# Altium PCB EEM_FMC_Carrier.PcbDoc (part 1 of 19)
Units mm, origin at the board's own origin, x right, y up, seen from the top; angles counter-clockwise.
Board outline 222.9 x 100 mm, 6 copper layers (TopLayer, MidLayer1, MidLayer2, SignalLayer1, Internal Plane 1, BottomLayer), stack 1.528 mm thick; 790 components, 743 nets, 3570 pads, 2277 vias.
Unrouted connection lines stored in the file: 3.
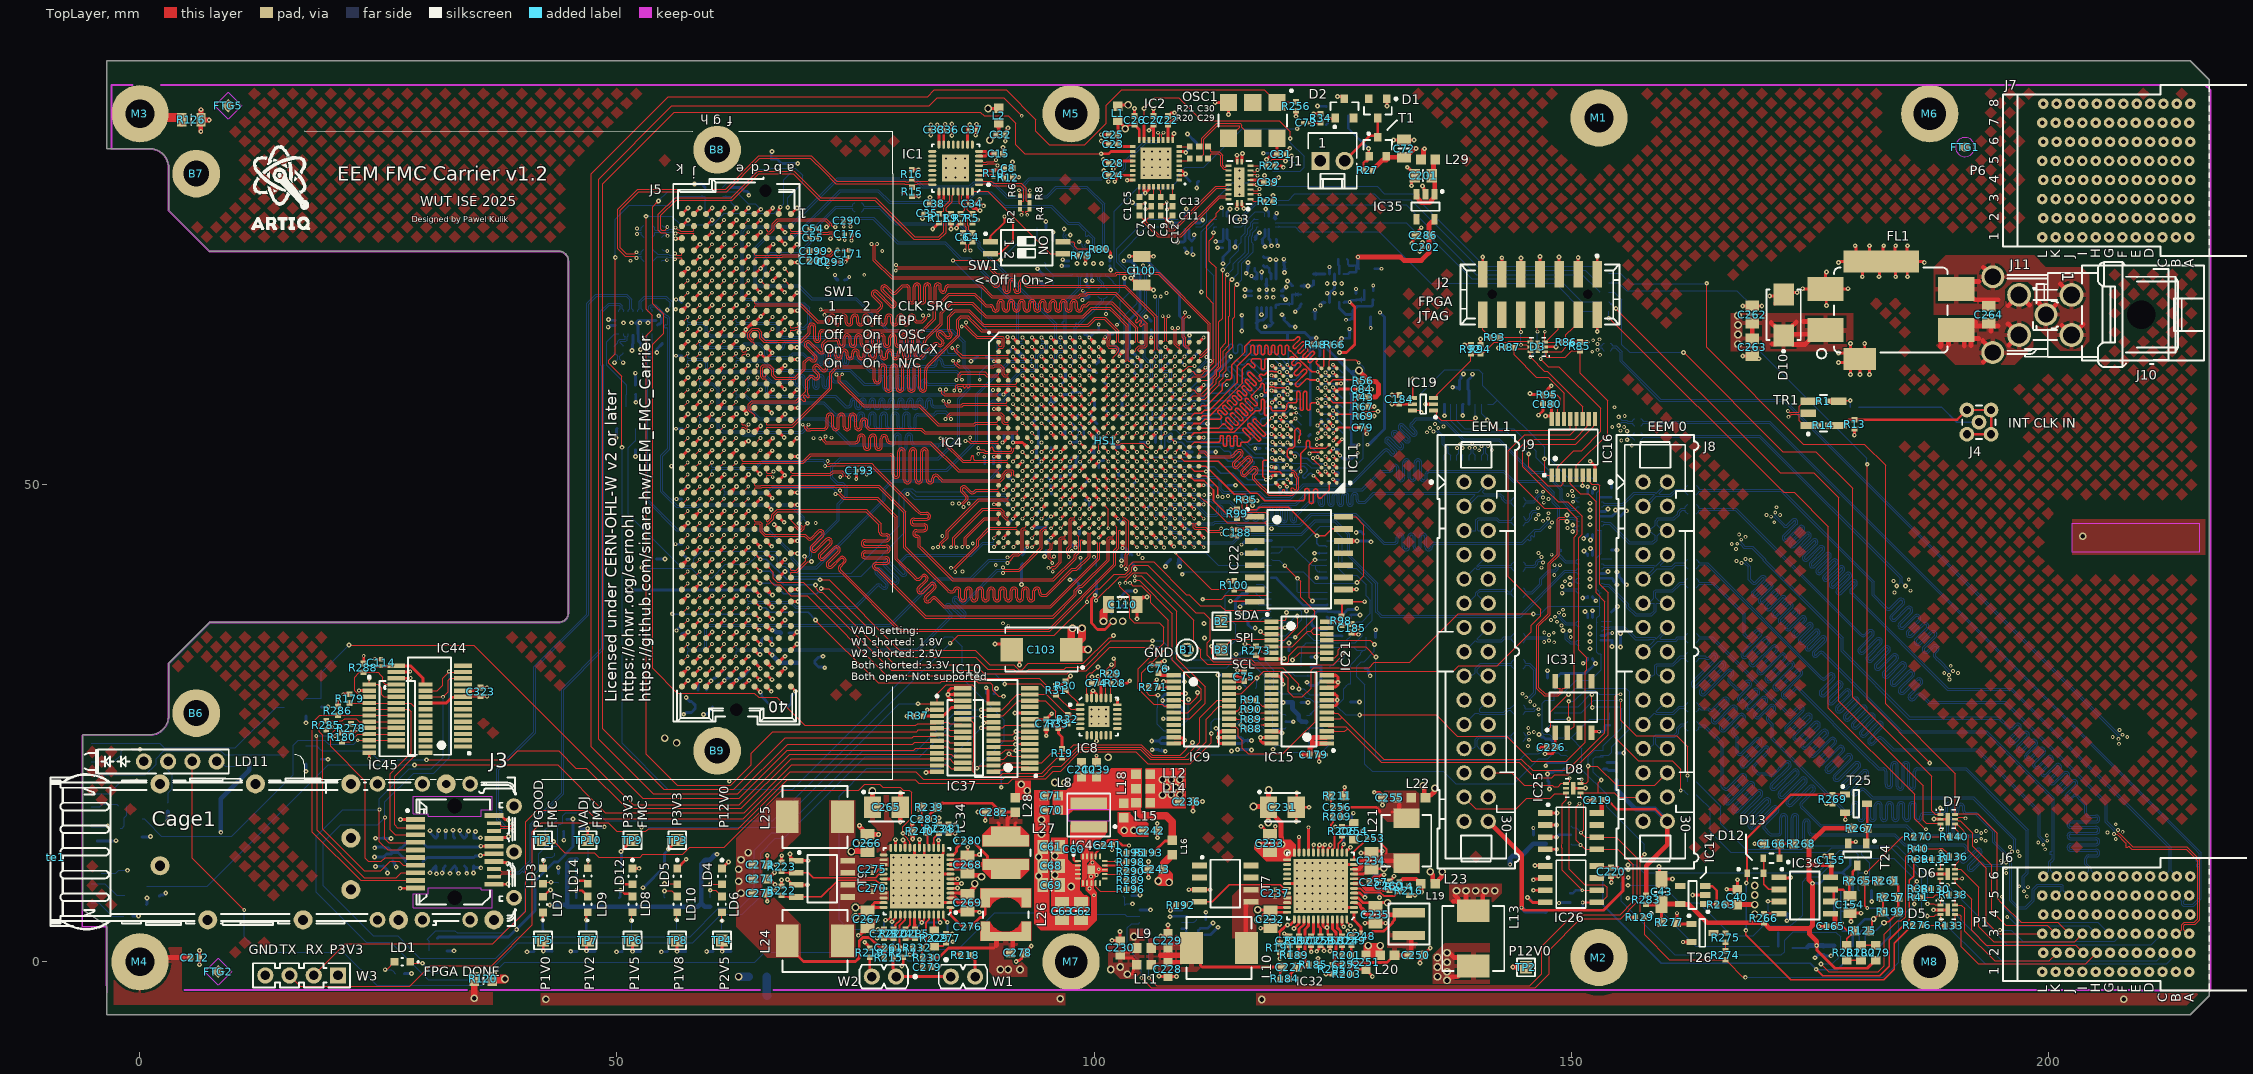
[diagram p0: TopLayer view]
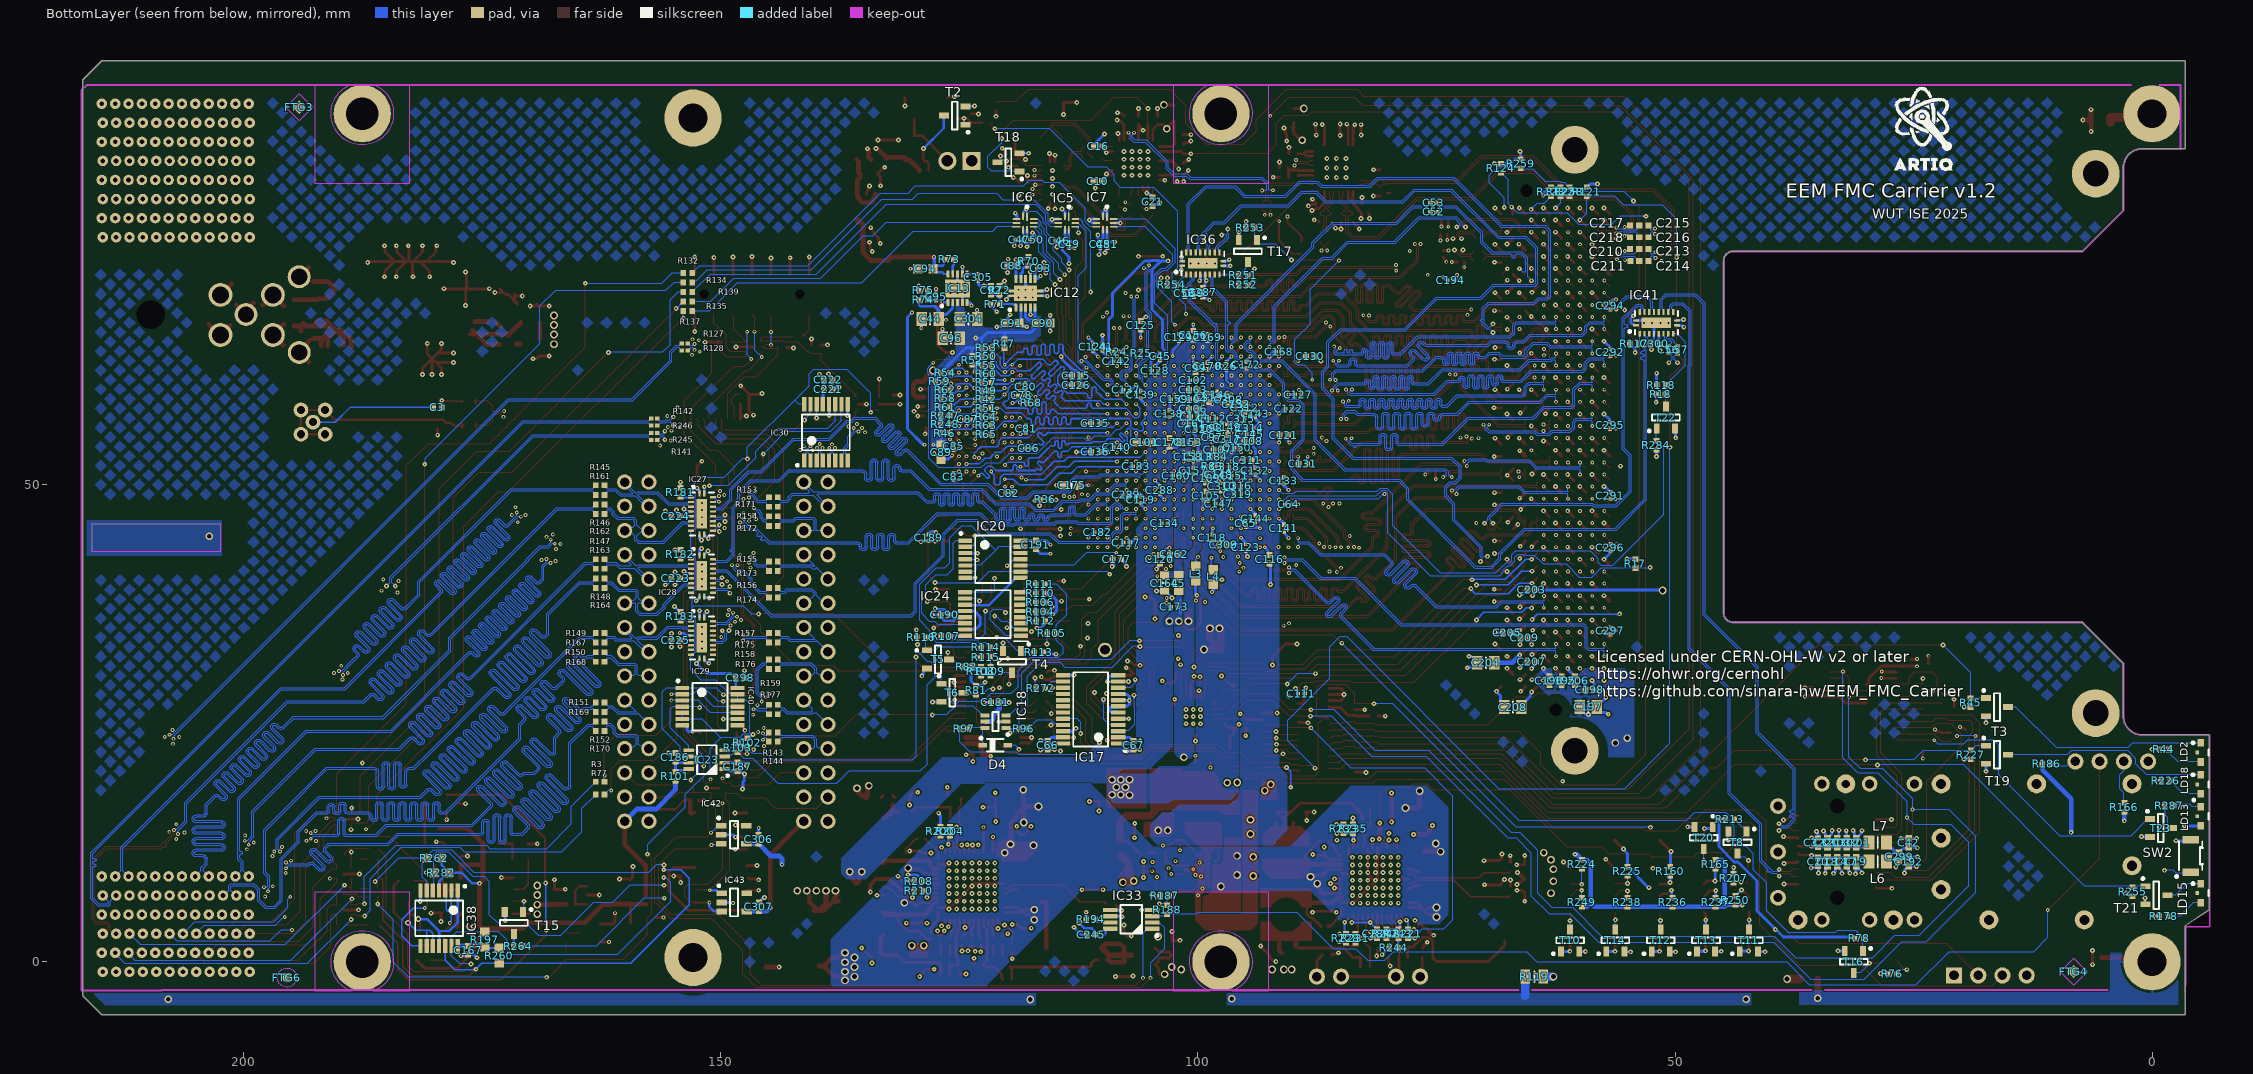
[diagram p1: BottomLayer view, seen from below]
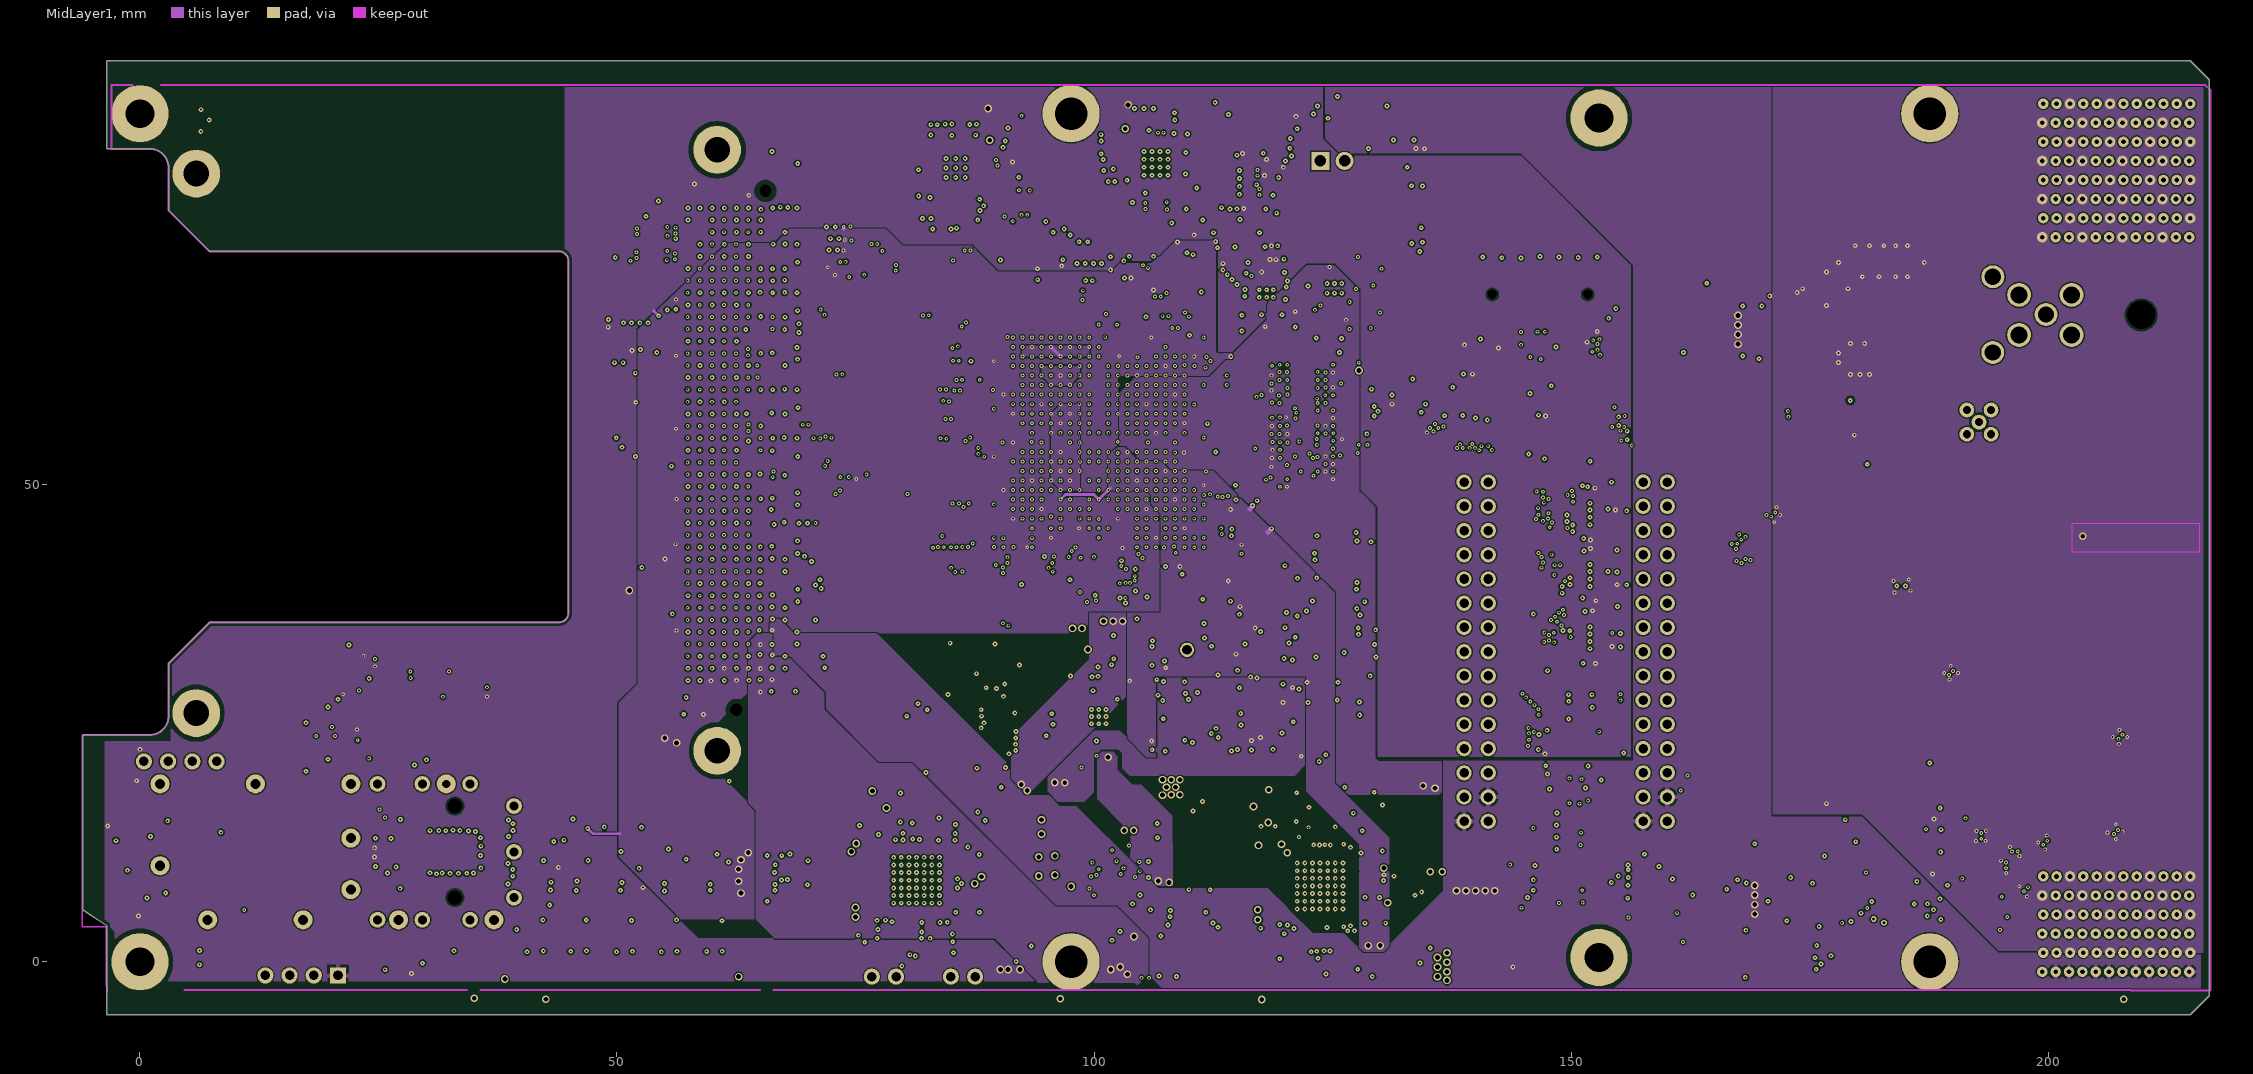
[diagram p2: MidLayer1]
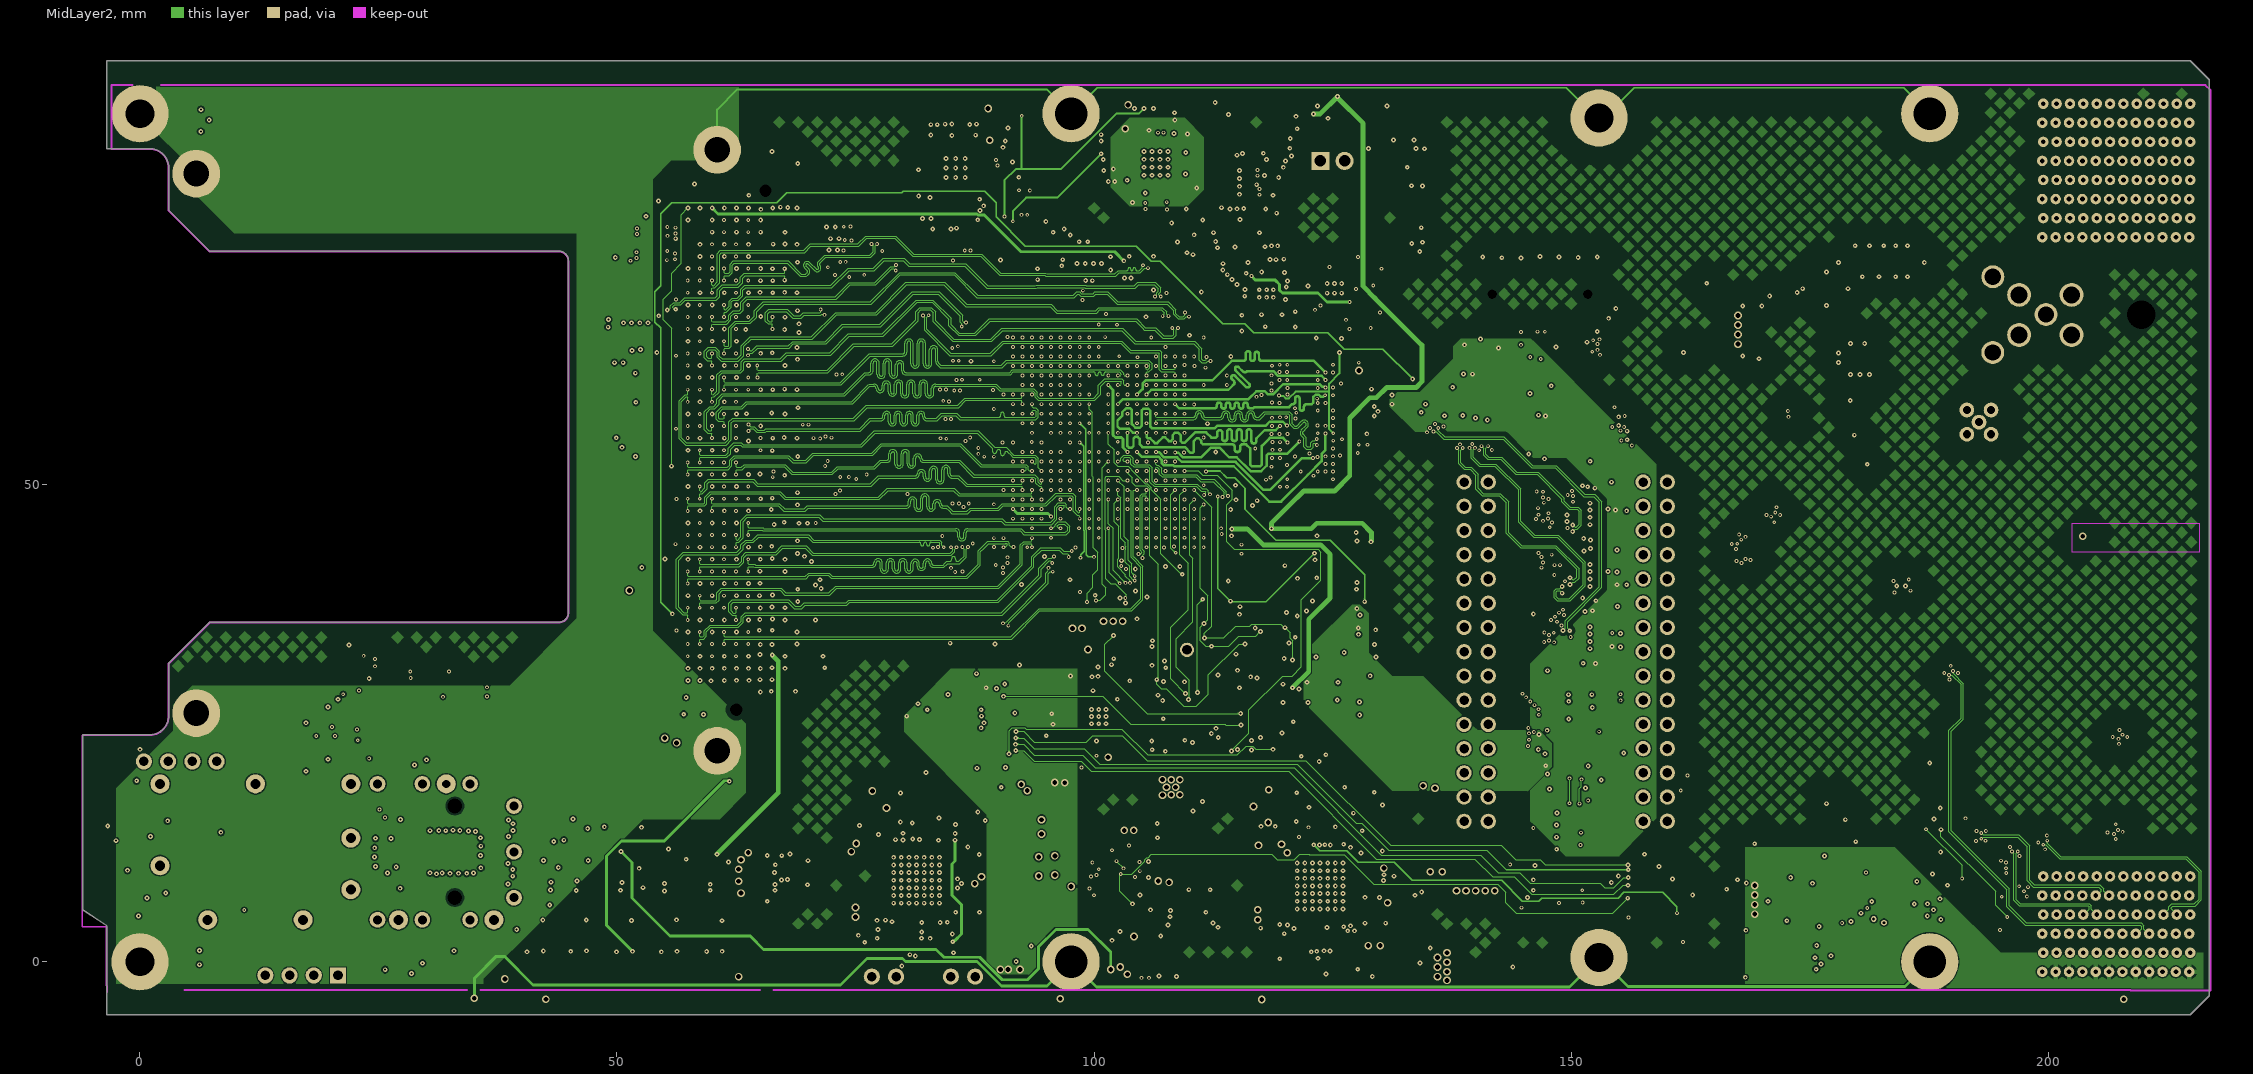
[diagram p3: MidLayer2]
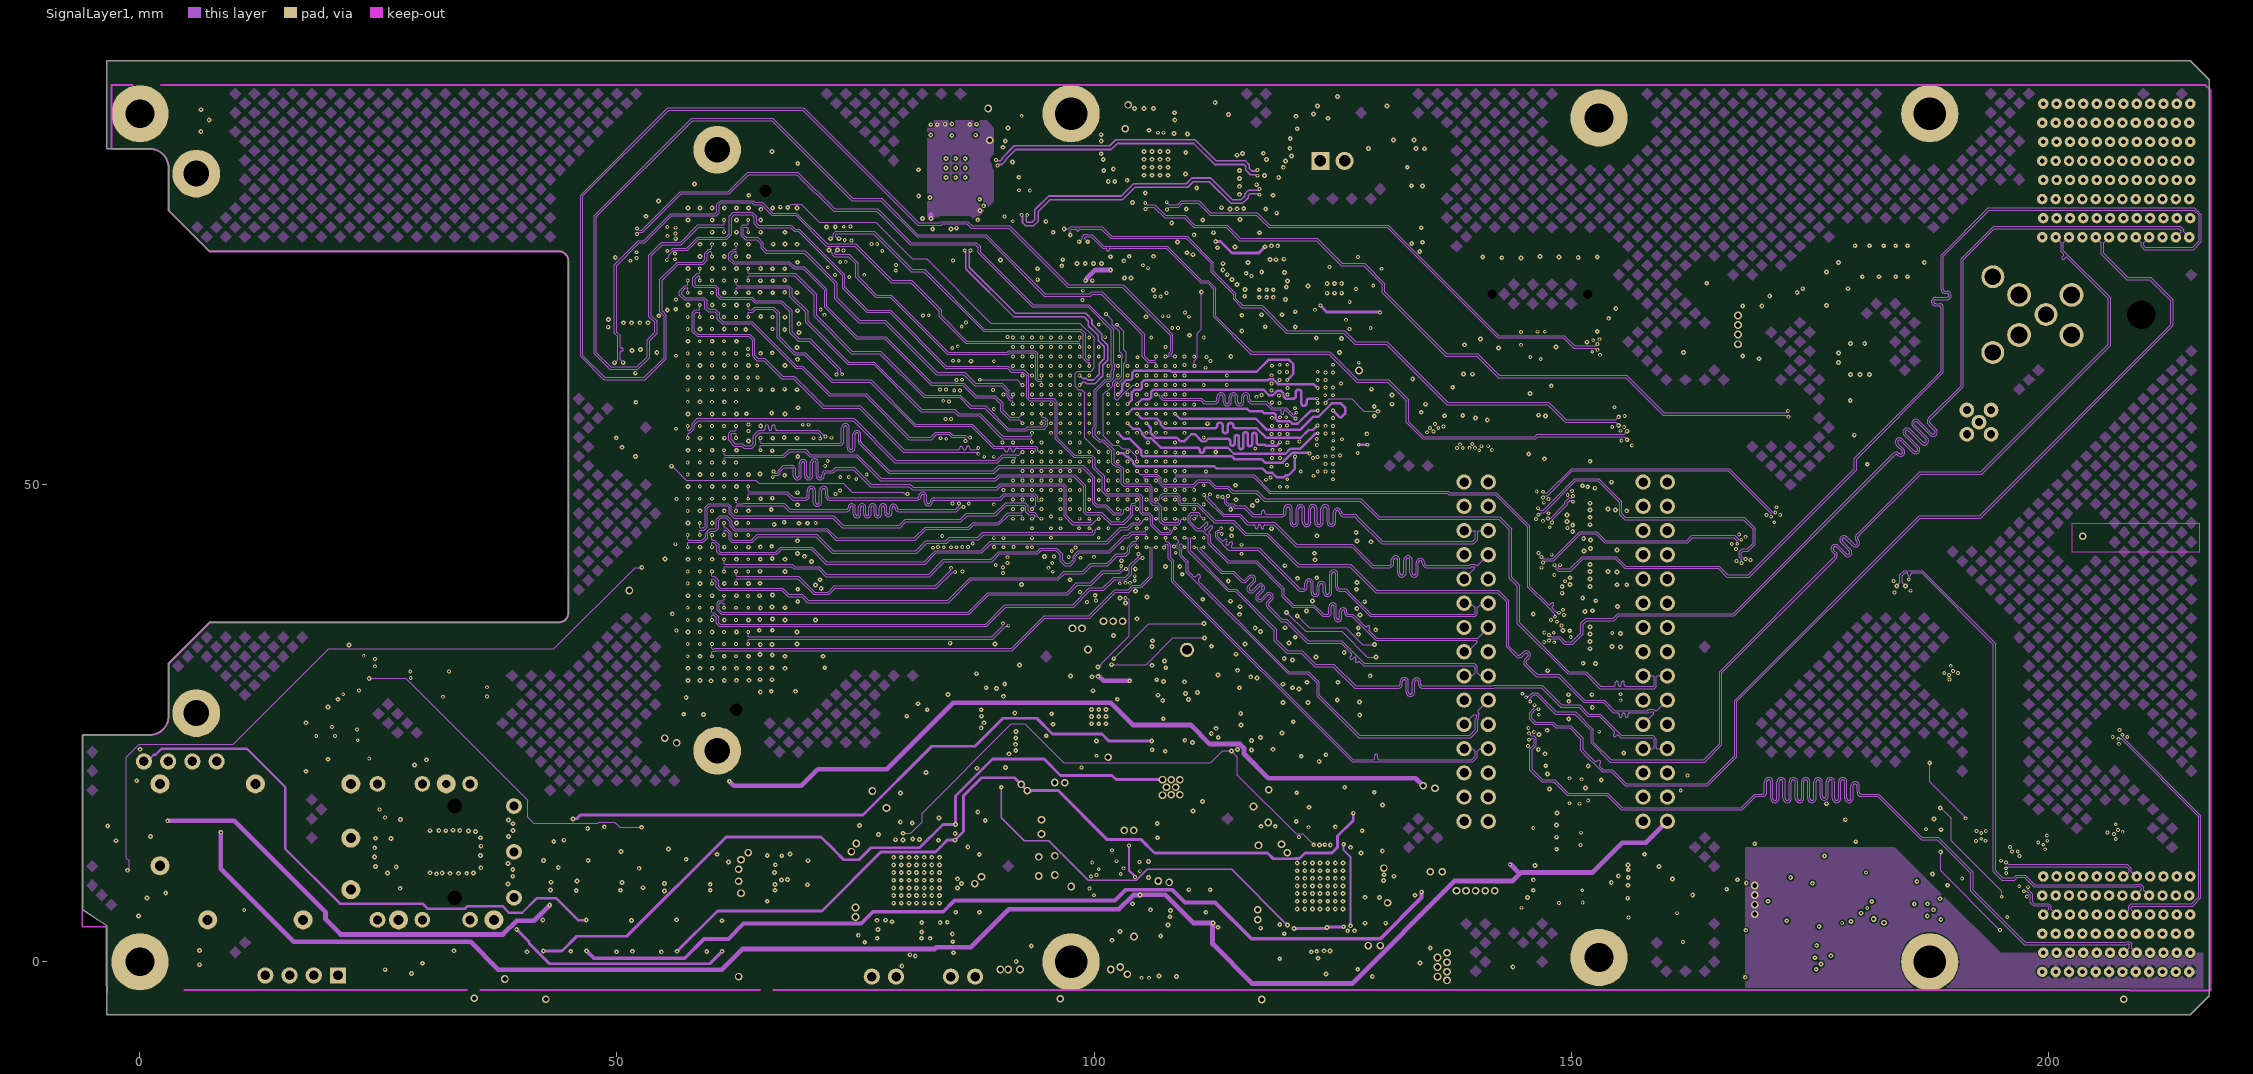
[diagram p4: SignalLayer1]
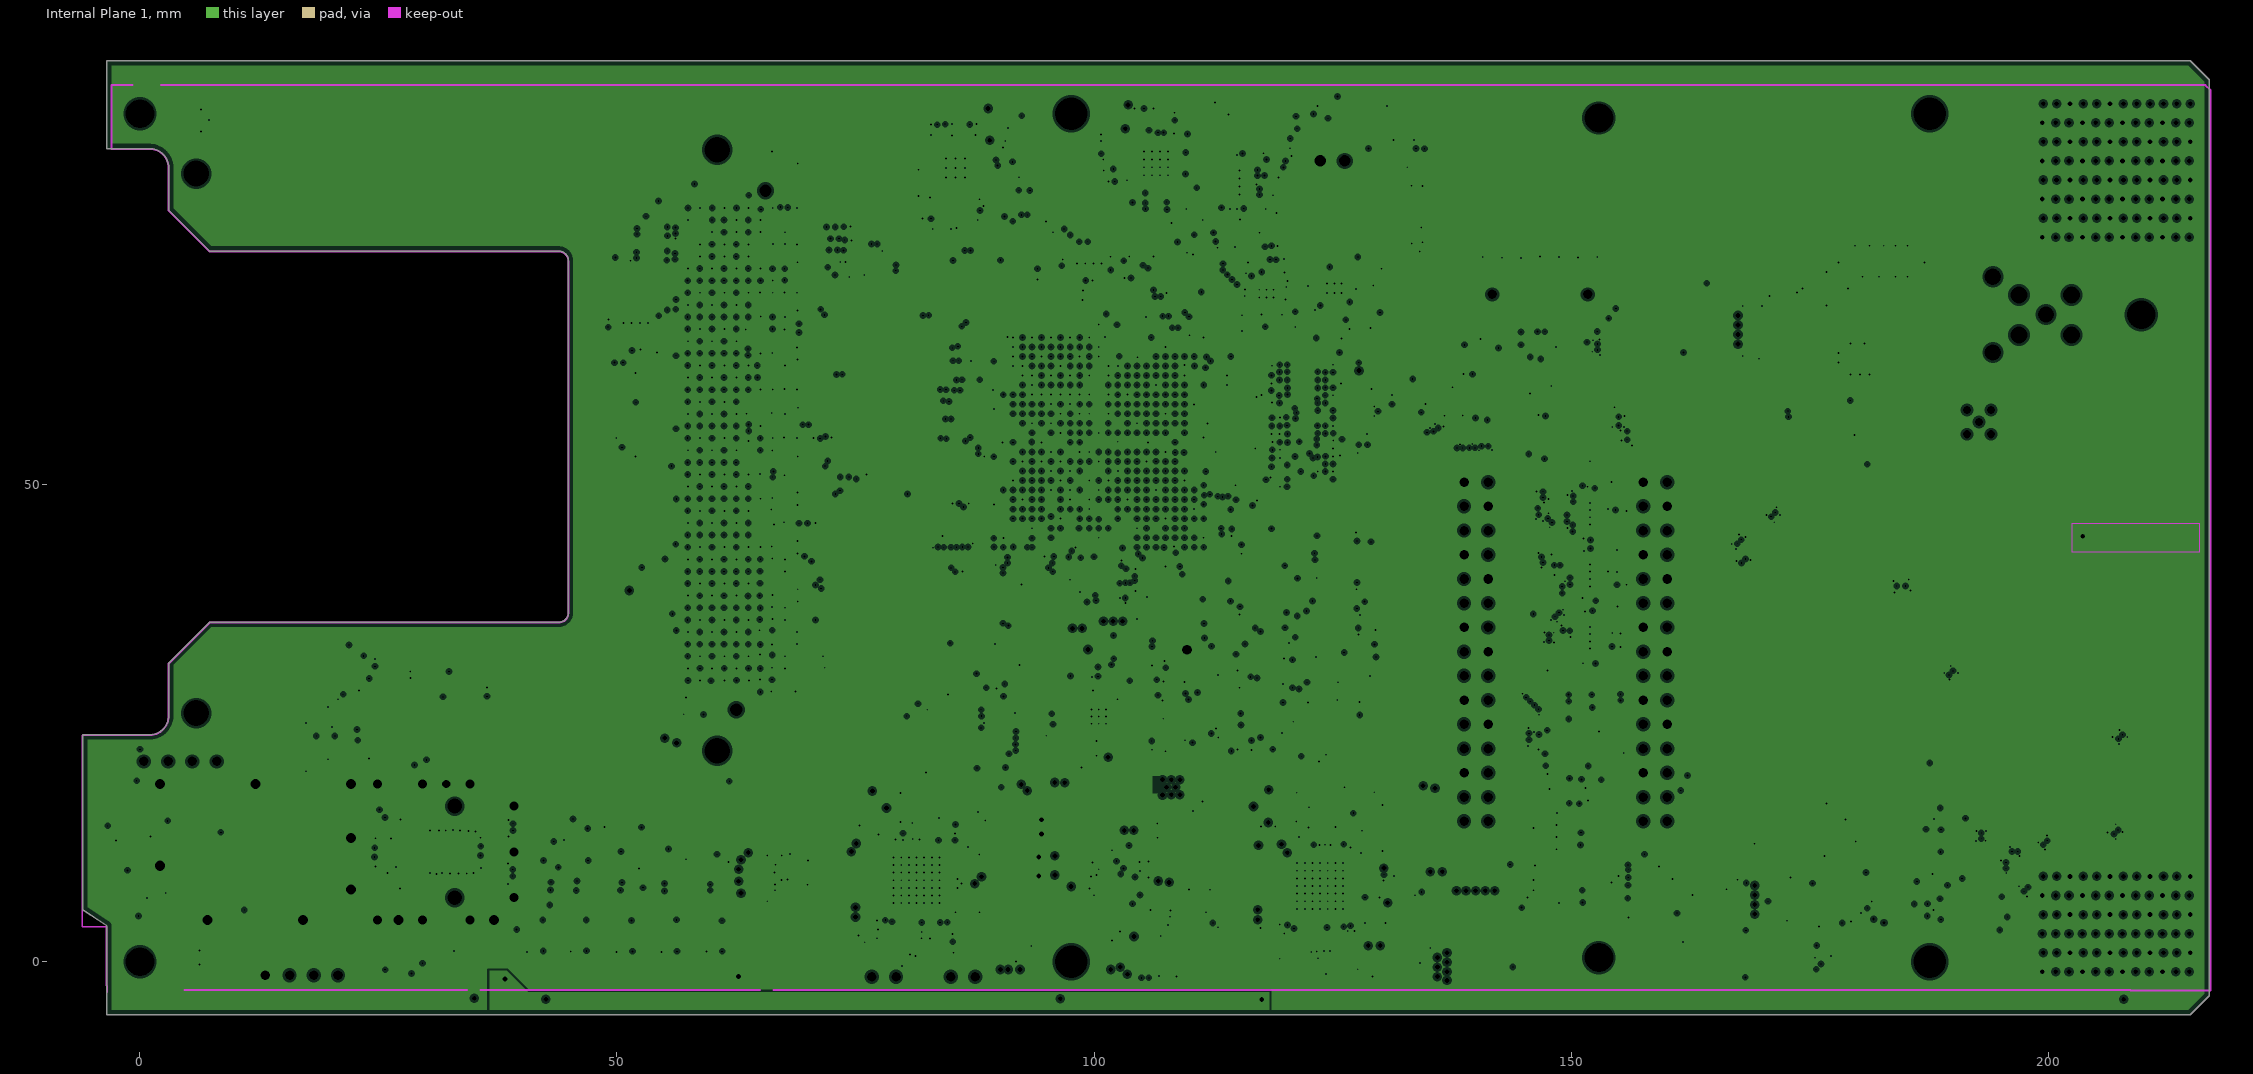
[diagram p5: Internal Plane 1, clearances drawn from the general rule]

## Layer stack, top to bottom
TopSolder: solder mask 0.022, Solder Resist, Dk 3.5
TopLayer: signal copper 0.053
Dielectric1: core 0.11, FR-4, Dk 4.2
MidLayer1: signal copper 0.018
Dielectric2: prepreg 0.2, FR-4, Dk 4.2
MidLayer2: signal copper 0.018
Dielectric3: core 0.73, FR-4, Dk 4.2
SignalLayer1: signal copper 0.018
Dielectric4: prepreg 0.2, FR-4, Dk 4.2
Internal Plane 1: plane copper 0.018, net (Multiple Nets)
Dielectric5: core 0.11, FR-4, Dk 4.2
BottomLayer: signal copper 0.053
BottomSolder: solder mask 0.022, Solder Resist, Dk 3.5

## Board outline
-3.5,-5.55 -3.5,3.8 -6,5.45 -6,23.8 -3.002,23.8 0.998,23.8 ccw(c0.998,25.8) 2.998,25.8 2.998,31.3 7.298,35.6 43.898,35.6 ccw(c43.898,36.6) 44.898,36.6 44.898,73.5 ccw(c43.898,73.5) 43.898,74.5 7.273,74.5 7.298,74.5 2.998,78.8 2.998,83.25 ccw(c0.998,83.25) 0.998,85.25 -3.5,85.25 -3.5,94.45 214.9,94.45 216.9,92.45 216.9,-3.55 214.9,-5.55

## Design rules (kind name [scope] priority, off if disabled: settings)
AcuteAngle [All] p1: minimum=4.50000000000000E+0001 checktracksonly=FALSE
AssemblyTestPointUsage [All] p1 off:
AssemblyTestpoint [All] p1 off: testpointundercomponent=TRUE minsize=1.016 maxsize=2.54 preferedsize=1.524 minholesize=0 maxholesize=1.016 preferedholesize=0.813 testpointgrid=0.025 usegrid=TRUE gridtolerance=0 allowsidetop=TRUE allowsidebottom=TRUE
BoardOutlineClearance BoardOutlineClearance_1 [OnLayer('BottomOverlay', 'TopOverlay')] p1: gap=0 ignorepadtopadclearanceinfootprint=FALSE
BoardOutlineClearance [All] p2: gap=0.4 ignorepadtopadclearanceinfootprint=FALSE
Clearance Clearance_Balancing [InPolygonClass('Copper_Balancing') vs InAnyNet] p1: gap=2 ignorepadtopadclearanceinfootprint=FALSE
Clearance Clearance_front [InComponent('LD15', 'LD18', 'LD2', 'J3', 'SW2', 'LD13'); vs OnLayer('Keep-Out Layer')] p2: gap=0 ignorepadtopadclearanceinfootprint=FALSE
Clearance Clearance_FPGA_outer [IsVia and WithinRoom('U_FPGA_FMC') vs IsCopperRegion] p3: gap=0.254 ignorepadtopadclearanceinfootprint=FALSE except(0: Arc-Hole Track-Hole SMDPad-Hole THPad-Hole Via-Hole Fill-Hole Poly-Hole Region-Hole Text-Hole Hole-Hole; 0.125: Via-Fill Via-Poly Via-Region; 0.2: Arc-Region Track-Region SMDPad-Region THPad-Region Fill-Region Poly-Region Region-Region)
Clearance Clearance_mounting_hole_top_bottom [InPadClass('MH') vs OnTop or OnBottom] p4: gap=1 ignorepadtopadclearanceinfootprint=FALSE except(0: Hole-Hole)
Clearance Clearance_mounting_holes [InPadClass('MH') vs OnCopper] p5: gap=0.5 ignorepadtopadclearanceinfootprint=FALSE except(0: Hole-Hole)
Clearance Clearance_mgt_via [(Net like ('*MGT*' )) and IsVia vs (Net like ('*MGT*' )) and IsVia] p6: gap=0.08 ignorepadtopadclearanceinfootprint=FALSE except(0: Hole-Hole; 0.4: Via-Via)
Clearance Clearance_diff_via [IsVia vs IsVia] p7: gap=0.254 ignorepadtopadclearanceinfootprint=FALSE except(0: Arc-Hole Track-Hole SMDPad-Hole THPad-Hole Via-Hole Fill-Hole Poly-Hole Region-Hole Text-Hole Hole-Hole; 0.2: Via-Via; 0.245: THPad-Fill THPad-Poly THPad-Region)
Clearance Clearance_DDR [InNetClass('50Ohm') and not (TouchesRoom('U_FPGA_FMC') or TouchesRoom('U_FPGA_SDRAM'))] p8: gap=0.254 ignorepadtopadclearanceinfootprint=TRUE except(0: Arc-Hole Track-Hole SMDPad-Hole THPad-Hole Via-Hole Fill-Hole Poly-Hole Region-Hole Text-Hole Hole-Hole; 0.54: Arc-Arc Arc-Track Track-Track)
Clearance Clearance_diff [InDifferentialPairClass('All Differential Pairs') and not TouchesRoom('U_FPGA_FMC')] p9: gap=0.54 ignorepadtopadclearanceinfootprint=FALSE except(0: Arc-Hole Track-Hole SMDPad-Hole THPad-Hole Via-Hole Fill-Hole Poly-Hole Region-Hole Text-Hole; 0.076: Arc-Via Track-Via SMDPad-Via; 0.1: Arc-Arc Arc-Track Arc-SMDPad Track-Track Track-SMDPad; 0.125: Track-Region SMDPad-Region; 0.127: THPad-Fill THPad-Poly THPad-Region; 0.15: Arc-Region Via-Fill Via-Poly Via-Region Region-Region; 0.2: Arc-THPad Track-THPad SMDPad-SMDPad THPad-Via Via-Via)
Clearance Clearance_outer [OnLayer('TopLayer') or OnLayer('BottomLayer')] p10: gap=0.1 ignorepadtopadclearanceinfootprint=TRUE except(0.089: Arc-Arc Arc-Track Arc-SMDPad Arc-Via Track-Track Track-SMDPad Track-Via SMDPad-SMDPad SMDPad-Via SMDPad-Fill SMDPad-Region THPad-Fill THPad-Region Hole-Hole; 0.127: Arc-Poly Track-Poly SMDPad-Poly THPad-Poly Fill-Poly Poly-Poly; 0.15: Via-Fill Via-Poly Via-Region Poly-Hole; 0.2: Arc-THPad Track-THPad SMDPad-THPad THPad-THPad THPad-Via Via-Hole Fill-Hole Region-Hole Text-Hole; 0.254: Arc-Text Track-Text SMDPad-Text THPad-Text Via-Text Fill-Text Poly-Text Region-Text Text-Text; 0.275: Via-Via)
Clearance Clearance_inner [(OnLayer('MidLayer1') OR OnLayer('MidLayer2') OR OnLayer('SignalLayer1'))] p11: gap=0.254 ignorepadtopadclearanceinfootprint=FALSE except(0.076: Arc-Arc Arc-Track Arc-SMDPad Arc-Via Track-Track Track-SMDPad Track-Via SMDPad-SMDPad SMDPad-Via SMDPad-Fill SMDPad-Region THPad-Fill THPad-Region; 0.1: Arc-Region Arc-Hole Track-Region Track-Hole; 0.127: Arc-Poly Track-Poly SMDPad-Poly THPad-Poly Fill-Poly; 0.15: Via-Fill Via-Poly Via-Region Region-Region; 0.152: Poly-Poly Poly-Region; 0.2: SMDPad-Hole THPad-Via THPad-Hole Via-Hole Fill-Hole Poly-Hole Region-Hole Text-Hole; 0.25: Arc-THPad Arc-Fill Track-THPad Track-Fill SMDPad-THPad THPad-THPad Via-Via Fill-Fill Fill-Region)
ComponentClearance ComponentClearance_Enclosure_holrd [InComponent('M*') vs OnTopLayer] p1: gap=-1 collisioncheckmode=3 verticalgap=-1 showdistances=FALSE
ComponentClearance ComponentClearance_Enclosure [Identifier = 'SI-DiotEnclosure-A01.v2' vs InComponent('M*')  or InComponent('J3') or InComponent('Cage1') or InComponent('J4') or InComponent('J10') or InComponent('J11') or InComponent('W*') or InComponent('LD11') or InComponent('J1') or InComponent('TP6')] p2: gap=-1 collisioncheckmode=3 verticalgap=-1 showdistances=TRUE donotcheckwithout3dbody=TRUE
ComponentClearance ComponentClearance_Front_Panel [Identifier = 'EEMFMC-A03.iam.v1.1' vs InComponent('Cage1') or InComponent('M*') or InComponent('SW2') or (Identifier = 'SI-DiotEnclosure-A01.v2')] p3: gap=-1 collisioncheckmode=3 verticalgap=-1 showdistances=TRUE donotcheckwithout3dbody=TRUE
ComponentClearance ComponentClearance_8 [InComponent('J5') vs InComponent('B8','B9')] p4: gap=0 collisioncheckmode=3 verticalgap=0.254 showdistances=FALSE
ComponentClearance ComponentClearance_6 [InComponent('J3') OR InComponent('WASHER2') vs (InComponent('WASHER1') OR InComponent('WASHER2')) OR Identifier = '7579'] p5: gap=0 collisioncheckmode=3 verticalgap=0 showdistances=FALSE
ComponentClearance ComponentClearance_3 [Identifier = '2';] p6: gap=-1 collisioncheckmode=3 verticalgap=-1 showdistances=FALSE
ComponentClearance ComponentClearance_1 [Identifier = '30848356-EEMFMC-A01.v1';] p7: gap=-1 collisioncheckmode=3 verticalgap=-1 showdistances=FALSE
ComponentClearance ComponentClearance_exception2 [InComponent('C1', 'C2','C9','C11','C29','C30','R2','R4','C217','C218','C210','C211') vs InComponent('R6', 'R8', 'C5','C7','C13','R21','R20','C12','C215','C216','C213','C214')] p8: gap=-1 collisioncheckmode=3 verticalgap=-1 showdistances=FALSE
ComponentClearance ComponentClearance_exception1 [InComponent('TR1') vs InComponent('R1', 'R14')] p9: gap=-1 collisioncheckmode=3 verticalgap=-1 showdistances=FALSE
ComponentClearance ComponentClearance_5 [InComponent('IC44') vs InComponent('IC45')] p10: gap=-1 collisioncheckmode=3 verticalgap=-1 showdistances=FALSE
ComponentClearance ComponentClearance_7 [InComponent('Cage1') vs InComponent('Plate1')] p11: gap=-1 collisioncheckmode=3 verticalgap=-1 showdistances=FALSE
ComponentClearance ComponentClearance_exceptions [InComponent('J10') vs InComponent('J11')] p12: gap=-1 collisioncheckmode=3 verticalgap=-1 showdistances=FALSE
ComponentClearance ComponentClearance_2 [InComponent('IC10') vs InComponent('IC37')] p13: gap=-1 collisioncheckmode=3 verticalgap=-1 showdistances=FALSE
ComponentClearance ComponentClearance_4 [InComponent('HS1') vs InComponent('IC4')] p14: gap=-1 collisioncheckmode=3 verticalgap=-1 showdistances=FALSE
ComponentClearance [All] p15: gap=0.15 collisioncheckmode=3 verticalgap=0.15 showdistances=FALSE
DiffPairsRouting [InDifferentialPairClass('MGT')] p1: maxlimit=0.254 minlimit=0.127 mostfreqgap=0.127 toplayer_maxgap=0.127 toplayer_minwidth=0.085 toplayer_maxwidth=0.085 toplayer_prefwidth=0.085 midlayer2_maxgap=0.127 midlayer2_minwidth=0.11 midlayer2_maxwidth=0.11 midlayer2_prefwidth=0.11 midlayer7_maxgap=0.127 midlayer7_minwidth=0.11 midlayer7_maxwidth=0.11 midlayer7_prefwidth=0.11 bottomlayer_maxgap=0.127 bottomlayer_minwidth=0.085 bottomlayer_maxwidth=0.085 bottomlayer_prefwidth=0.085 impedanceprofiledriven=TRUE impedanceprofileid={FB752EDA-940F-4D5F-A599-D27A4E1750A0} impedanceprofilevalue=100.000000 maxuncoupledlength=12.7
DiffPairsRouting DiffPairsRouting_lvpecl [InDifferentialPairClass('LVPECL')] p2: maxlimit=0.25 minlimit=0.127 mostfreqgap=0.21 toplayer_mingap=0.15 toplayer_maxgap=0.15 toplayer_prefgap=0.15 toplayer_minwidth=0.1 toplayer_maxwidth=0.1 toplayer_prefwidth=0.1 midlayer2_mingap=0.21 midlayer2_maxgap=0.21 midlayer2_minwidth=0.17 midlayer2_maxwidth=0.17 midlayer2_prefwidth=0.17 midlayer7_mingap=0.21 midlayer7_maxgap=0.21 midlayer7_minwidth=0.17 midlayer7_maxwidth=0.17 midlayer7_prefwidth=0.17 bottomlayer_maxgap=0.127 bottomlayer_prefgap=0.127 bottomlayer_minwidth=0.1 bottomlayer_maxwidth=0.1 bottomlayer_prefwidth=0.1 impedanceprofiledriven=TRUE impedanceprofileid={F7C7CEB7-EAD5-4268-B863-B9A45AF52FBC} impedanceprofilevalue=100.000000 maxuncoupledlength=3
DiffPairsRouting DiffPairsRouting_100_Ohm [InDifferentialPairClass('Diff_100Ohm')] p3: maxlimit=0.25 minlimit=0.127 mostfreqgap=0.127 toplayer_maxgap=0.127 toplayer_minwidth=0.085 toplayer_maxwidth=0.085 toplayer_prefwidth=0.085 midlayer2_maxgap=0.127 midlayer2_minwidth=0.11 midlayer2_maxwidth=0.11 midlayer2_prefwidth=0.11 midlayer7_maxgap=0.127 midlayer7_minwidth=0.11 midlayer7_maxwidth=0.11 midlayer7_prefwidth=0.11 bottomlayer_maxgap=0.127 bottomlayer_minwidth=0.085 bottomlayer_maxwidth=0.085 bottomlayer_prefwidth=0.085 impedanceprofiledriven=TRUE impedanceprofileid={FB752EDA-940F-4D5F-A599-D27A4E1750A0} impedanceprofilevalue=100.000000 maxuncoupledlength=11.1
FabricationTestPointUsage TestPointUsage [All] p1: valid=0 allowmultiple=FALSE
FabricationTestpoint Testpoint [All] p1: side=3 testpointundercomponent=TRUE minsize=1.016 maxsize=2.54 preferedsize=1.524 minholesize=0.508 maxholesize=1.016 preferedholesize=0.813 testpointgrid=0.025 allowsidetop=TRUE allowsidebottom=TRUE usegrid=TRUE gridtolerance=0
Height Height_Bot [OnLayer('BottomLayer')] p1: minheight=0 maxheight=1.6 prefheight=1
Height [All] p2: minheight=0 maxheight=25.4 prefheight=12.7
HoleSize [All] p1: absolutevalues=TRUE maxlimit=3.4 minlimit=0.15 maxpercent=80.000 minpercent=20.000
HoleToHoleClearance [All] p1: gap=0.15 allowstackedmicrovias=TRUE
MatchedLengths "Schematic Matched Net Lengths_7" [InNetClass('FMC_DP_CLK')] p1: tolerance=0.15 checknetsindiffpair=TRUE checkdiffpairvsdiffpair=FALSE checkxsignals=FALSE checkothers=FALSE usedelayunits=TRUE delaytolerance=11.000000
MatchedLengths "Schematic Matched Net Lengths_5" [InNetClass('FMC_CLK')] p2: tolerance=0.15 checknetsindiffpair=TRUE checkdiffpairvsdiffpair=FALSE checkxsignals=FALSE checkothers=FALSE usedelayunits=TRUE delaytolerance=11.000000
MatchedLengths "Schematic Matched Net Lengths_4" [InNetClass('FMC_CLK')] p3: tolerance=0.15 checknetsindiffpair=TRUE checkdiffpairvsdiffpair=FALSE checkxsignals=FALSE checkothers=FALSE usedelayunits=TRUE delaytolerance=11.000000
MatchedLengths "Schematic Matched Net Lengths_3" [InNetClass('FMC_DP')] p4: tolerance=0.15 checknetsindiffpair=TRUE checkdiffpairvsdiffpair=FALSE checkxsignals=FALSE checkothers=FALSE usedelayunits=TRUE delaytolerance=1.000000
MatchedLengths "Schematic Matched Net Lengths_2" [InNetClass('FMC_DP')] p5: tolerance=0.15 checknetsindiffpair=TRUE checkdiffpairvsdiffpair=FALSE checkxsignals=FALSE checkothers=FALSE usedelayunits=TRUE delaytolerance=1.000000
MatchedLengths "Schematic Matched Net Lengths_1" [InNetClass('FMC_DP')] p6: tolerance=0.15 checknetsindiffpair=TRUE checkdiffpairvsdiffpair=FALSE checkxsignals=FALSE checkothers=FALSE usedelayunits=TRUE delaytolerance=1.000000
MatchedLengths "Schematic Matched Net Lengths" [InNetClass('FMC_DP')] p7: tolerance=0.15 checknetsindiffpair=TRUE checkdiffpairvsdiffpair=FALSE checkxsignals=FALSE checkothers=FALSE usedelayunits=TRUE delaytolerance=1.000000
MatchedLengths "Schematic Matched Net Lengths_MGT_in" [InDifferentialPairClass('MGT')] p8: tolerance=0.15 checknetsindiffpair=TRUE checkdiffpairvsdiffpair=FALSE checkxsignals=FALSE checkothers=FALSE usedelayunits=TRUE delaytolerance=1.000000
MatchedLengths MatchedLengths_xCPCIS_in [InxSignalClass('xSignals_CPCIS')] p9: tolerance=25.4 checknetsindiffpair=TRUE checkdiffpairvsdiffpair=FALSE checkxsignals=FALSE checkothers=FALSE usedelayunits=TRUE delaytolerance=5.000000
MatchedLengths MatchedLengths_xCPCIS_g [InxSignalClass('xSignals_CPCIS')] p10: tolerance=25.4 checknetsindiffpair=FALSE checkdiffpairvsdiffpair=TRUE checkxsignals=TRUE checkothers=TRUE usedelayunits=TRUE delaytolerance=10.000000
MatchedLengths MatchedLengths_xEEM1_in [InxSignalClass('xSignals_EEM1')] p11: tolerance=25.4 checknetsindiffpair=TRUE checkdiffpairvsdiffpair=FALSE checkxsignals=FALSE checkothers=FALSE usedelayunits=TRUE delaytolerance=1.000000
MatchedLengths MatchedLengths_xEEM1_g [InxSignalClass('xSignals_EEM1')] p12: tolerance=25.4 checknetsindiffpair=FALSE checkdiffpairvsdiffpair=TRUE checkxsignals=TRUE checkothers=TRUE usedelayunits=TRUE delaytolerance=10.000000
MatchedLengths MatchedLengths_xEEM0_in [InxSignalClass('xSignals_EEM0')] p13: tolerance=25.4 checknetsindiffpair=TRUE checkdiffpairvsdiffpair=FALSE checkxsignals=FALSE checkothers=FALSE usedelayunits=TRUE delaytolerance=1.000000
MatchedLengths MatchedLengths_xEEM0_g [InxSignalClass('xSignals_EEM0')] p14: tolerance=25.4 checknetsindiffpair=FALSE checkdiffpairvsdiffpair=TRUE checkxsignals=TRUE checkothers=TRUE usedelayunits=TRUE delaytolerance=10.000000
MatchedLengths MatchedLengths_xDATA_BL1_g [InxSignalClass('DATA_BL1')] p15: tolerance=1 checknetsindiffpair=FALSE checkdiffpairvsdiffpair=TRUE checkxsignals=TRUE checkothers=TRUE usedelayunits=TRUE delaytolerance=10.000000
MatchedLengths MatchedLengths_xDATA_BL1_in [InxSignalClass('DATA_BL1')] p16: tolerance=1 checknetsindiffpair=TRUE checkdiffpairvsdiffpair=FALSE checkxsignals=FALSE checkothers=FALSE usedelayunits=TRUE delaytolerance=1.000000
MatchedLengths MatchedLengths_xDATA_BL0_g [InxSignalClass('DATA_BL0')] p17: tolerance=1.3 checknetsindiffpair=FALSE checkdiffpairvsdiffpair=TRUE checkxsignals=TRUE checkothers=TRUE usedelayunits=TRUE delaytolerance=10.000000
MatchedLengths MatchedLengths_xDATA_BL0_in [InxSignalClass('DATA_BL0')] p18: tolerance=1 checknetsindiffpair=TRUE checkdiffpairvsdiffpair=FALSE checkxsignals=FALSE checkothers=FALSE usedelayunits=TRUE delaytolerance=1.000000
MatchedLengths MatchedLengths_xADDR_PP1_g [InxSignalClass('ADDR_PP1')] p19: tolerance=2 checknetsindiffpair=FALSE checkdiffpairvsdiffpair=TRUE checkxsignals=TRUE checkothers=TRUE usedelayunits=TRUE delaytolerance=25.000000
MatchedLengths MatchedLengths_xADDR_PP1_in [InxSignalClass('ADDR_PP1')] p20: tolerance=1 checknetsindiffpair=TRUE checkdiffpairvsdiffpair=FALSE checkxsignals=FALSE checkothers=FALSE usedelayunits=TRUE delaytolerance=1.000000
MatchedLengths MatchedLengths_MGT_in [InDifferentialPairClass('MGT')] p21: tolerance=25.4 checknetsindiffpair=TRUE checkdiffpairvsdiffpair=FALSE checkxsignals=FALSE checkothers=FALSE usedelayunits=TRUE delaytolerance=1.000000
MatchedLengths MatchedLengths_xFMC_LAx_g [InxSignalClass('FMC_LAx')] p22: tolerance=25.4 checknetsindiffpair=FALSE checkdiffpairvsdiffpair=TRUE checkxsignals=TRUE checkothers=TRUE usedelayunits=TRUE delaytolerance=80.000000
MatchedLengths MatchedLengths_xFMC_HBx_g [InxSignalClass('FMC_HBx')] p23: tolerance=25.4 checknetsindiffpair=FALSE checkdiffpairvsdiffpair=TRUE checkxsignals=TRUE checkothers=TRUE usedelayunits=TRUE delaytolerance=80.000000
MatchedLengths MatchedLengths_FMC_HAx_g [InxSignalClass('FMC_HAx')] p24: tolerance=25.4 checknetsindiffpair=FALSE checkdiffpairvsdiffpair=TRUE checkxsignals=TRUE checkothers=TRUE usedelayunits=TRUE delaytolerance=80.000000
MatchedLengths MatchedLengths_All_in [InDifferentialPairClass('All Differential Pairs')] p25: tolerance=5 checknetsindiffpair=TRUE checkdiffpairvsdiffpair=FALSE checkxsignals=FALSE checkothers=FALSE usedelayunits=TRUE delaytolerance=10.000000
MatchedLengths "Schematic Matched Net Lengths_FMC_DP_in" [InNetClass('FMC_DP')] p26: tolerance=0.15 checknetsindiffpair=TRUE checkdiffpairvsdiffpair=FALSE checkxsignals=FALSE checkothers=FALSE usedelayunits=TRUE delaytolerance=1.000000
MatchedLengths "Schematic Matched Net Lengths_FMC_DP_CLK_in" [InNetClass('FMC_DP_CLK')] p27: tolerance=0.15 checknetsindiffpair=TRUE checkdiffpairvsdiffpair=FALSE checkxsignals=FALSE checkothers=FALSE usedelayunits=TRUE delaytolerance=11.000000
MatchedLengths "Schematic Matched Net Lengths_FMC_CLK_in" [InNetClass('FMC_CLK')] p28: tolerance=0.15 checknetsindiffpair=TRUE checkdiffpairvsdiffpair=FALSE checkxsignals=FALSE checkothers=FALSE usedelayunits=TRUE delaytolerance=11.000000
MatchedLengths MatchedLengths_EEM0_g [InNetClass('EEM0')] p29: tolerance=10 checknetsindiffpair=FALSE checkdiffpairvsdiffpair=TRUE checkxsignals=TRUE checkothers=TRUE
MatchedLengths MatchedLengths_EEM1_g [InNetClass('EEM1')] p30: tolerance=10 checknetsindiffpair=FALSE checkdiffpairvsdiffpair=TRUE checkxsignals=TRUE checkothers=TRUE
MinimumSolderMaskSliver MinimumSolderMaskSliver_IC13 [InComponent('IC13')] p1: minsoldermaskwidth=0.051
MinimumSolderMaskSliver [All] p2: minsoldermaskwidth=0.1
ParallelSegment [All] p1 off: limit=5 gap=0.254
PlaneClearance [All] p1: clearance=0.254
PlaneConnect PlaneConnect_1 [HasCompParameterValue('PressFit', 'Yes')] p1: planeconnectstyle=Direct reliefexpansion=0.2 reliefentries=4 reliefconductorwidth=0.254 reliefairgap=0.254
PlaneConnect [All] p2: pad.planeconnectstyle=Relief pad.reliefexpansion=0.2 pad.reliefentries=4 pad.reliefconductorwidth=0.254 pad.reliefairgap=0.254 via.planeconnectstyle=Direct via.reliefexpansion=0.2 via.reliefentries=4 via.reliefconductorwidth=0.254 via.reliefairgap=0.15
PolygonConnect PolygonConnect_1 [All vs InComponentClass('Pressfit') or InPolygonClass('Direct')] p1: connectstyle=Direct reliefconductorwidth=0.254 reliefentries=2 polygonreliefangle="45 Angle" airgapwidth=0.254
PolygonConnect PolygonConnect_2 [InNetClass('PWR')] p2: thpad.connectstyle=Relief thpad.reliefconductorwidth=0.5 thpad.reliefentries=4 thpad.polygonreliefangle="90 Angle" thpad.airgapwidth=0.254 smdpad.connectstyle=Relief smdpad.reliefconductorwidth=0.5 smdpad.reliefentries=4 smdpad.polygonreliefangle="90 Angle" smdpad.airgapwidth=0.25 via.connectstyle=Direct via.reliefconductorwidth=0.254 via.reliefentries=2 via.polygonreliefangle="90 Angle" via.airgapwidth=0.254
PolygonConnect [All] p3: thpad.connectstyle=Relief thpad.reliefconductorwidth=0.254 thpad.reliefentries=4 thpad.polygonreliefangle="90 Angle" thpad.airgapwidth=0.254 smdpad.connectstyle=Relief smdpad.reliefconductorwidth=0.254 smdpad.reliefentries=4 smdpad.polygonreliefangle="90 Angle" smdpad.airgapwidth=0.254 via.connectstyle=Direct via.reliefconductorwidth=0.254 via.reliefentries=4 via.polygonreliefangle="90 Angle" via.airgapwidth=0.254
ReturnPath [All] p1: impedanceprofileid={766963E9-4C46-4FD0-92C7-72FE31CC1419} _gaplimit=0 _useantipads=TRUE
ReturnPath ReturnPath_1 [All] p2: impedanceprofileid={FB752EDA-940F-4D5F-A599-D27A4E1750A0} _gaplimit=0 _useantipads=TRUE
ReturnPath ReturnPath_2 [All] p3: impedanceprofileid={F7C7CEB7-EAD5-4268-B863-B9A45AF52FBC} _gaplimit=0
RoomDefinition U_PWR_Supply [InComponentClass('U_PWR_Supply')] p1: confinementstyle=ConfineIn formatcopy=TRUE lockcomponents=FALSE outline 62.573,-3.075 128.023,-3.075 128.023,18.225 62.573,18.225
RoomDefinition U_FPGA_SUP_CFG [InComponentClass('U_FPGA_SUP_CFG')] p2: confinementstyle=ConfineIn formatcopy=TRUE lockcomponents=FALSE outline 142.998,-39.55 193.998,-39.55 193.998,-17.8 142.998,-17.8
RoomDefinition U_FPGA_SDRAM [InComponentClass('U_FPGA_SDRAM')] p3: confinementstyle=ConfineIn formatcopy=TRUE lockcomponents=FALSE outline 110.198,47.85 129.448,47.85 129.448,77.75 110.198,77.75
RoomDefinition U_FPGA_GTP [InComponentClass('U_FPGA_GTP')] p4: confinementstyle=ConfineIn formatcopy=TRUE lockcomponents=FALSE outline 72.469,45.071 103.937,45.071 103.937,78.829 72.469,78.829
RoomDefinition U_FPGA_FMC [InComponentClass('U_FPGA_FMC')] p5: confinementstyle=ConfineIn formatcopy=TRUE lockcomponents=FALSE outline 88.498,42.45 112.498,42.45 112.498,66.45 88.498,66.45
RoomDefinition U_FPGA_EEM_Misc [InComponentClass('U_FPGA_EEM_Misc')] p6: confinementstyle=ConfineIn formatcopy=TRUE lockcomponents=FALSE outline 18.998,-39.55 63.498,-39.55 63.498,-17.8 18.998,-17.8
RoomDefinition U_FMC_connector [InComponentClass('U_FMC_connector')] p7: confinementstyle=ConfineIn formatcopy=TRUE lockcomponents=FALSE outline 52.148,22.075 71.898,22.075 71.898,84.675 52.148,84.675
RoomDefinition U_CLK_INPUT [InComponentClass('U_CLK_INPUT')] p8: confinementstyle=ConfineIn formatcopy=TRUE lockcomponents=FALSE outline 78.998,74.2 112.498,74.2 112.498,94.45 78.998,94.45
RoomDefinition U_CFG_FLASH_Update [InComponentClass('U_CFG_FLASH_Update')] p9: confinementstyle=ConfineIn formatcopy=TRUE lockcomponents=FALSE outline 108.098,20.45 127.498,20.45 127.498,47.7 108.098,47.7
RoomDefinition EEM_FMC_Carrier [InComponentClass('EEM_FMC_Carrier')] p10: confinementstyle=ConfineIn formatcopy=TRUE lockcomponents=FALSE outline 86.748,-39.55 134.998,-39.55 134.998,-18.05 86.748,-18.05
RoomDefinition EEM_Connectors_JTAG [InComponentClass('EEM_Connectors_JTAG')] p11: confinementstyle=ConfineIn formatcopy=TRUE lockcomponents=FALSE outline 127.348,2.4 156.448,2.4 156.448,60.25 127.348,60.25
RoomDefinition CPCIS_Connectors_P1_P6 [InComponentClass('CPCIS_Connectors_P1_P6')] p12: confinementstyle=ConfineIn formatcopy=TRUE lockcomponents=FALSE outline 161.148,-4.675 229.823,-4.675 229.823,94.55 161.148,94.55
RoutingLayers RoutingLayers_1 [InAnyDifferentialPair] p1: top layer_v5=TRUE mid layer 1_v5=FALSE mid layer 2_v5=TRUE mid layer 7_v5=TRUE bottom layer_v5=TRUE
RoutingLayers RoutingLayers_2 [InNetClass('50Ohm')] p2: top layer_v5=TRUE mid layer 1_v5=FALSE mid layer 2_v5=TRUE mid layer 7_v5=TRUE bottom layer_v5=TRUE
RoutingLayers [All] p3: top layer_v5=TRUE mid layer 1_v5=TRUE mid layer 2_v5=TRUE mid layer 7_v5=TRUE bottom layer_v5=TRUE
RoutingTopology RoutingTopology_DDRAddressAndControls [InNetClass('DDR_AddressAndControls')] p1: topology=Daisy_Simple
RoutingTopology RoutingTopology_DDRAddressAndControls_1 [InNetClass('DDR_AddressAndControls_1')] p2: topology=Daisy_Simple
RoutingTopology [All] p3: topology=Shortest
RoutingVias RoutingVias_3 [InDifferentialPairClass('MGT')] p1: holewidth=0.15 width=0.35 viastyle="Through Hole" minholewidth=0.15 minwidth=0.35 maxholewidth=0.6 maxwidth=0.8 useviatemplates=TRUE viatemplateguid#1={168CC3D4-46A9-4D9D-BB95-029752B0A818} viatemplateguid#2={8CC95450-9C4C-4A66-BFBB-022CCA0C80F0} viatemplatename#1=v40h20 viatemplatename#2=v50h20
RoutingVias RoutingVias_1 [InDifferentialPairClass('LVPECL')] p2: holewidth=0.15 width=0.35 viastyle="Through Hole" minholewidth=0.15 minwidth=0.35 maxholewidth=0.6 maxwidth=0.8 useviatemplates=TRUE viatemplateguid#1={168CC3D4-46A9-4D9D-BB95-029752B0A818} viatemplatename#1=v40h20
RoutingVias RoutingVias_diff [InDifferentialPairClass('Diff_100Ohm')] p3: holewidth=0.711 width=1.27 viastyle="Through Hole" minholewidth=0.711 minwidth=1.27 maxholewidth=0.711 maxwidth=1.27 useviatemplates=TRUE viatemplateguid#1={168CC3D4-46A9-4D9D-BB95-029752B0A818} viatemplateguid#2={8CC95450-9C4C-4A66-BFBB-022CCA0C80F0} viatemplatename#1=v40h20 viatemplatename#2=v50h20
RoutingVias RoutingVias_2 [InNetClass('PWR')] p4: holewidth=0.15 width=0.35 viastyle="Through Hole" minholewidth=0.15 minwidth=0.35 maxholewidth=0.6 maxwidth=0.8 useviatemplates=TRUE viatemplateguid#1={168CC3D4-46A9-4D9D-BB95-029752B0A818} viatemplateguid#2={8CC95450-9C4C-4A66-BFBB-022CCA0C80F0} viatemplateguid#3={6D5B961F-E4A3-4BBF-BC74-0D55AAD43065} viatemplateguid#4={7BA2FAF8-F5E9-4BF3-9BD8-21DB5C2C29C0} viatemplatename#1=v40h20 viatemplatename#2=v50h20 viatemplatename#3=v50h20m55 viatemplatename#4=v80h50
RoutingVias [All] p5: holewidth=0.15 width=0.35 viastyle="Through Hole" minholewidth=0.15 minwidth=0.35 maxholewidth=0.6 maxwidth=0.8 useviatemplates=TRUE viatemplateguid#1={168CC3D4-46A9-4D9D-BB95-029752B0A818} viatemplateguid#2={8CC95450-9C4C-4A66-BFBB-022CCA0C80F0} viatemplateguid#3={9B6D1E41-F68F-46C8-B44C-A11188DE9BC7} viatemplateguid#4={7BA2FAF8-F5E9-4BF3-9BD8-21DB5C2C29C0} viatemplatename#1=v40h20 viatemplatename#2=v50h20 viatemplatename#3=v60h30 viatemplatename#4=v80h50
SMDEntry [All] p1 off: side=TRUE corner=TRUE anyangle=FALSE
SilkToSilkClearance SilkToSilkClearance_1 [InComponent('J10')  or InComponent('J7') vs InComponent('J11') or InComponent('J7')] p1: silktosilkclearance=-0.1
SilkToSilkClearance [All] p2: silktosilkclearance=0.15
SilkToSolderMaskClearance SilkscreenOverComponentPads [IsPad] p1: minsilkscreentomaskgap=0.025 clearancetoexposedcopper=FALSE
SolderMaskExpansion SolderMaskExpansion_1 [IsVia] p1: expansion=0.05 istentingtop=TRUE
SolderMaskExpansion [All] p2: expansion=0.05 istentingtop=FALSE
StubLength [All] p1: limit=3
SupplyNets "Schematic Supply Nets_27" [InNet('STRIP1')] p1: voltage=0.000
SupplyNets "Schematic Supply Nets_26" [InNet('VTT_DDR3')] p2: voltage=0.000
SupplyNets "Schematic Supply Nets_25" [InNet('FMC_VREFB_M2C')] p3: voltage=0.000
SupplyNets "Schematic Supply Nets_24" [InNet('VCCAUX')] p4: voltage=0.000
SupplyNets "Schematic Supply Nets_23" [InNet('VREF_DDR3')] p5: voltage=0.000
SupplyNets "Schematic Supply Nets_22" [InNet('P1V8')] p6: voltage=0.000
SupplyNets "Schematic Supply Nets_21" [InNet('P1V0')] p7: voltage=0.000
SupplyNets "Schematic Supply Nets_20" [InNet('VADJ_FMC')] p8: voltage=0.000
SupplyNets "Schematic Supply Nets_19" [InNet('P1V5')] p9: voltage=0.000
SupplyNets "Schematic Supply Nets_18" [InNet('P3V3_MP2')] p10: voltage=0.000
SupplyNets "Schematic Supply Nets_17" [InNet('VCCBRAM')] p11: voltage=0.000
SupplyNets "Schematic Supply Nets_16" [InNet('P3V3_MP_B')] p12: voltage=0.000
SupplyNets "Schematic Supply Nets_15" [InNet('MGTAVCC')] p13: voltage=0.000
SupplyNets "Schematic Supply Nets_14" [InNet('P2V5')] p14: voltage=0.000
SupplyNets "Schematic Supply Nets_13" [InNet('P3V3')] p15: voltage=0.000
SupplyNets "Schematic Supply Nets_12" [InNet('P1V2')] p16: voltage=0.000
SupplyNets "Schematic Supply Nets_11" [InNet('FMC_VIO_B_M2C')] p17: voltage=0.000
SupplyNets "Schematic Supply Nets_10" [InNet('P12V0_SMPS')] p18: voltage=0.000
SupplyNets "Schematic Supply Nets_9" [InNet('P3V3_MP')] p19: voltage=0.000
SupplyNets "Schematic Supply Nets_7" [InNet('P3V3_CLK_MUX')] p20: voltage=0.000
SupplyNets "Schematic Supply Nets_6" [InNet('P3V3_FMC')] p21: voltage=0.000
SupplyNets "Schematic Supply Nets_5" [InNet('GND')] p22: voltage=0.000
SupplyNets "Schematic Supply Nets_4" [InNet('FMC_VREFA_M2C')] p23: voltage=0.000
SupplyNets "Schematic Supply Nets_3" [InNet('MGTAVTT')] p24: voltage=0.000
SupplyNets "Schematic Supply Nets_2" [InNet('P5V0')] p25: voltage=0.000
SupplyNets "Schematic Supply Nets_1" [InNet('P12V0')] p26: voltage=0.000
SupplyNets "Schematic Supply Nets" [InNet('P3V3_ADCLK')] p27: voltage=0.000
UnConnectedPin [All] p1 off:
UnRoutedNet UnRoutedNet_1 [Not (InNet('STRIP1') or InNet('FMC_VIO_B_M2C') or InPolygonClass('Copper_Balancing'))] p1: checkbadconnections=TRUE
UnpouredPolygon UnpouredPolygon_1 [InPolygonClass('Copper_Balancing')] p1: allowunpoured=TRUE
UnpouredPolygon [All] p2:
ViasUnderSMD [All] p1: allowed=TRUE
Width Width_pwr [InNetClass('PWR')] p1: maxlimit=2 minlimit=0.3 preferedwidth=0.3 minimp=50.000000 maximp=50.000000 favimp=50.000000
Width Width_50Ohm [InNetClass('50Ohm')] p2: maxlimit=1 minlimit=0.16 preferedwidth=0.26 toplayer_maxwidth=0.16 toplayer_prefwidth=0.16 midlayer2_minwidth=0.26 midlayer2_maxwidth=0.26 midlayer7_minwidth=0.26 midlayer7_maxwidth=0.26 bottomlayer_maxwidth=0.16 bottomlayer_prefwidth=0.16 impedanceprofiledriven=TRUE impedanceprofileid={766963E9-4C46-4FD0-92C7-72FE31CC1419} impedanceprofilevalue=50.000000 minimp=50.000000 maximp=50.000000 favimp=50.000000
Width [All] p3: maxlimit=2 minlimit=0.08 preferedwidth=0.125 toplayer_minwidth=0.09 bottomlayer_minwidth=0.09 minimp=50.000000 maximp=50.000000 favimp=50.000000
12 further rules are at their usual default settings.

## Classes and differential pairs
component class U_Power_Supply_1V0: C60 C61 C62 C63 C68 C69 C70 C71 C236 C239 C240 C241 C242 C243 IC46 L8 L12 L14 L15 L16 L18 R193 R195 R196 R198 R289 R290
component class U_FPGA_EEM_Misc: C66 C67 C72 C73 C75 C76 D1 D2 IC9 IC17 J1 R27 R34 R35 R36 R129 R271 R272 R273 T1 T2 W3
polygon class Direct: GND_L02_P225 NETC237_1_L01_P184 NETC246_1_L01_P185 NETC253_1_L01_P236 NETC255_2_L01_P187 NETC270_1_L01_P181 NETC275_1_L01_P180 STRIP1_L03_P232 VADJ_FMC_L01_P179 VCCAUX_L06_P211 VCCBRAM_L06_P210 VTT_DDR3_L06_P223
pad class ViaInPad: IC1-33 IC2-33 IC3-21 IC8-25 IC12-11 IC13-4 IC13-11 IC27-21 IC28-21 IC29-21 IC32-49 IC34-49 IC36-21
polygon class Copper_Balancing: BAL_BOT BAL_TOP ML1_BAL ML2_BAL
differential pair class MGT: BP_MGT.Rx BP_MGT.Tx BP_MGT_Rx BP_MGT_Tx FMC_MGT.DP_C2M0 FMC_MGT.DP_C2M1 FMC_MGT.DP_C2M2 FMC_MGT.DP_C2M3 FMC_MGT.DP_C2M4 FMC_MGT.DP_C2M5 FMC_MGT.DP_C2M6 FMC_MGT.DP_C2M7 FMC_MGT.DP_C2M8 FMC_MGT.DP_C2M9 FMC_MGT.DP_M2C0 FMC_MGT.DP_M2C1 FMC_MGT.DP_M2C2 FMC_MGT.DP_M2C3 FMC_MGT.DP_M2C4 FMC_MGT.DP_M2C5 FMC_MGT.DP_M2C6 FMC_MGT.DP_M2C7 FMC_MGT.DP_M2C8 FMC_MGT.DP_M2C9 MGT_RX0 MGT_RX1 MGT_RX2 MGT_RX3 MGT_RXC2 MGT_RXC3 MGT_TX0 MGT_TX1 MGT_TX2 MGT_TX3 MGT_TXC2 MGT_TXC3 SFP_RD SFP_TD
differential pair class LVPECL: CK_MUX_OUT0 CLK_MUX_ALT_OUT0 CLK_MUX_ALT_OUT1 CLK_MUX_OUT0 FMC_CLK_BIDIR2 FMC_CLK_BIDIR3 FMC_REF0_CLK.CLK FMC_REF1_CLK.CLK GTP_CLK GTP_CLK.CLK
net class LVDS_DUAL_P[0..4]: LVDS_DUAL_P0 LVDS_DUAL_P1 LVDS_DUAL_P2 LVDS_DUAL_P3 LVDS_DUAL_P4
net class LVDS_DUAL_N[0..4]: LVDS_DUAL_N0 LVDS_DUAL_N1 LVDS_DUAL_N2 LVDS_DUAL_N3 LVDS_DUAL_N4
net class CLK_SEL[0..1]: CLK_SEL0 CLK_SEL1
net class ESD_STRIP: STRIP1 STRIP2 STRIP3
net class PWR: GND MGTAVCC MGTAVTT NetC227_2 NetC250_2 NetC255_2 NetC264_1 NetC264_2 NetC276_1 NetC282_2 P1V0 P1V0_NF P1V2 P1V5 P1V8 P2V5 P3V3 P3V3_FMC P12V0 P12V0_SMPS VADJ_FMC VCCBRAM
differential pair class Diff_100Ohm: BP_IO.LVDS0 BP_IO.LVDS1 BP_IO.LVDS2 BP_IO.LVDS3 BP_IO.LVDS4 BP_IO.LVDS5 BP_IO.LVDS6 BP_IO.LVDS7 BP_IO.LVDS8 BP_IO.LVDS9 BP_IO.LVDS10 BP_IO.LVDS11 BP_IO.LVDS12 BP_IO.LVDS13 BP_IO.LVDS14 BP_IO.LVDS15 CK_MMCX CK_MMCX_ALT CK_MMCX_IN CK_OSC CK_OSC_ALT CK_SMA CK_SMA_ALT CK_SMA_IN DDR3_CK DDR3_LDQS DDR3_UDQS EEM_IO.LVDS0 EEM_IO.LVDS1 EEM_IO.LVDS2 EEM_IO.LVDS3 EEM_IO.LVDS4 EEM_IO.LVDS5 EEM_IO.LVDS6 EEM_IO.LVDS7 EEM_IO.LVDS8 EEM_IO.LVDS9 EEM_IO.LVDS10 EEM_IO.LVDS11 EEM_IO.LVDS12 EEM_IO.LVDS13 EEM_IO.LVDS14 EEM_IO.LVDS15 FMC.HA0 FMC.HA1 FMC.HA2 FMC.HA3 FMC.HA4 FMC.HA5 FMC.HA6 FMC.HA7 FMC.HA8 FMC.HA9 FMC.HA10 FMC.HA11 FMC.HA12 FMC.HA13 FMC.HA14 FMC.HA15 FMC.HA16 FMC.HA17 FMC.HA18 FMC.HA19 FMC.HA20 FMC.HA21 FMC.HA22 FMC.HA23 FMC.HB0 FMC.HB1 FMC.HB2 FMC.HB3 FMC.HB4 FMC.HB5 FMC.HB6 FMC.HB7 FMC.HB8 FMC.HB9 FMC.HB10 FMC.HB11 FMC.HB12 FMC.HB13 FMC.HB14 FMC.HB15 FMC.HB16 FMC.HB17 FMC.HB18 FMC.HB19 FMC.HB20 FMC.HB21 FMC.LA0 FMC.LA1 FMC.LA2 FMC.LA3 FMC.LA4 FMC.LA5 FMC.LA6 FMC.LA7 FMC.LA8 FMC.LA9 FMC.LA10 FMC.LA11 FMC.LA12 FMC.LA13 FMC.LA14 FMC.LA15 FMC.LA16 FMC.LA17 FMC.LA18 FMC.LA19 FMC.LA20 FMC.LA21 FMC.LA22 FMC.LA23 FMC.LA24 FMC.LA25 FMC.LA26 FMC.LA27 FMC.LA28 FMC.LA29 FMC.LA30 FMC.LA31 FMC.LA32 FMC.LA33 FMC_CLK.CLK_BIDIR2 FMC_CLK.CLK_BIDIR3 FMC_CLK.CLK_M2C0 FMC_CLK.CLK_M2C1 FMC_MGT.GBTCLK_M2C0 FMC_MGT.GBTCLK_M2C1 GBTCLK0_M2C LVDS_DUAL0 LVDS_DUAL1 LVDS_DUAL2 LVDS_DUAL3 LVDS_DUAL4 LVDS_JTAG_TCK LVDS_JTAG_TDI LVDS_JTAG_TDO LVDS_JTAG_TMS LVDS_JTAG_TRSTn MGT_OR_LVDS OSC PE_CK PE_CLK PE_CLK.CLK PE_CLK_ALT
differential pair class FMC_LA: FMC.LA0 FMC.LA1 FMC.LA2 FMC.LA3 FMC.LA4 FMC.LA5 FMC.LA6 FMC.LA7 FMC.LA8 FMC.LA9 FMC.LA10 FMC.LA11 FMC.LA12 FMC.LA13 FMC.LA14 FMC.LA15 FMC.LA16 FMC.LA17 FMC.LA18 FMC.LA19 FMC.LA20 FMC.LA21 FMC.LA22 FMC.LA23 FMC.LA24 FMC.LA25 FMC.LA26 FMC.LA27 FMC.LA28 FMC.LA29 FMC.LA30 FMC.LA31 FMC.LA32 FMC.LA33
differential pair class FMC_HB: FMC.HB0 FMC.HB1 FMC.HB2 FMC.HB3 FMC.HB4 FMC.HB5 FMC.HB6 FMC.HB7 FMC.HB8 FMC.HB9 FMC.HB10 FMC.HB11 FMC.HB12 FMC.HB13 FMC.HB14 FMC.HB15 FMC.HB16 FMC.HB17 FMC.HB18 FMC.HB19 FMC.HB20 FMC.HB21
differential pair class FMC_HA: FMC.HA0 FMC.HA1 FMC.HA2 FMC.HA3 FMC.HA4 FMC.HA5 FMC.HA6 FMC.HA7 FMC.HA8 FMC.HA9 FMC.HA10 FMC.HA11 FMC.HA12 FMC.HA13 FMC.HA14 FMC.HA15 FMC.HA16 FMC.HA17 FMC.HA18 FMC.HA19 FMC.HA20 FMC.HA21 FMC.HA22 FMC.HA23
net class SHARED_BUS_[0..4]: SHARED_BUS_0 SHARED_BUS_1 SHARED_BUS_2 SHARED_BUS_3 SHARED_BUS_4
net class GA[0..3]: GA0 GA1 GA2 GA3
net class FMC_MGT.GBTCLK_M2C_P[0..1]: FMC_MGT.GBTCLK_M2C_P0 FMC_MGT.GBTCLK_M2C_P1
net class FMC_MGT.GBTCLK_M2C_N[0..1]: FMC_MGT.GBTCLK_M2C_N0 FMC_MGT.GBTCLK_M2C_N1
net class FMC_MGT.DP_M2C_P[0..9]: FMC_MGT.DP_M2C_P0 FMC_MGT.DP_M2C_P1 FMC_MGT.DP_M2C_P2 FMC_MGT.DP_M2C_P3 FMC_MGT.DP_M2C_P4 FMC_MGT.DP_M2C_P5 FMC_MGT.DP_M2C_P6 FMC_MGT.DP_M2C_P7 FMC_MGT.DP_M2C_P8 FMC_MGT.DP_M2C_P9
net class FMC_MGT.DP_M2C_N[0..9]: FMC_MGT.DP_M2C_N0 FMC_MGT.DP_M2C_N1 FMC_MGT.DP_M2C_N2 FMC_MGT.DP_M2C_N3 FMC_MGT.DP_M2C_N4 FMC_MGT.DP_M2C_N5 FMC_MGT.DP_M2C_N6 FMC_MGT.DP_M2C_N7 FMC_MGT.DP_M2C_N8 FMC_MGT.DP_M2C_N9
net class FMC_MGT.DP_C2M_P[0..9]: FMC_MGT.DP_C2M_P0 FMC_MGT.DP_C2M_P1 FMC_MGT.DP_C2M_P2 FMC_MGT.DP_C2M_P3 FMC_MGT.DP_C2M_P4 FMC_MGT.DP_C2M_P5 FMC_MGT.DP_C2M_P6 FMC_MGT.DP_C2M_P7 FMC_MGT.DP_C2M_P8 FMC_MGT.DP_C2M_P9
net class FMC_MGT.DP_C2M_N[0..9]: FMC_MGT.DP_C2M_N0 FMC_MGT.DP_C2M_N1 FMC_MGT.DP_C2M_N2 FMC_MGT.DP_C2M_N3 FMC_MGT.DP_C2M_N4 FMC_MGT.DP_C2M_N5 FMC_MGT.DP_C2M_N6 FMC_MGT.DP_C2M_N7 FMC_MGT.DP_C2M_N8 FMC_MGT.DP_C2M_N9
net class FMC_DP: FMC_MGT.DP_C2M_N0 FMC_MGT.DP_C2M_N1 FMC_MGT.DP_C2M_N2 FMC_MGT.DP_C2M_N3 FMC_MGT.DP_C2M_N4 FMC_MGT.DP_C2M_N5 FMC_MGT.DP_C2M_N6 FMC_MGT.DP_C2M_N7 FMC_MGT.DP_C2M_N8 FMC_MGT.DP_C2M_N9 FMC_MGT.DP_C2M_P0 FMC_MGT.DP_C2M_P1 FMC_MGT.DP_C2M_P2 FMC_MGT.DP_C2M_P3 FMC_MGT.DP_C2M_P4 FMC_MGT.DP_C2M_P5 FMC_MGT.DP_C2M_P6 FMC_MGT.DP_C2M_P7 FMC_MGT.DP_C2M_P8 FMC_MGT.DP_C2M_P9 FMC_MGT.DP_M2C_N0 FMC_MGT.DP_M2C_N1 FMC_MGT.DP_M2C_N2 FMC_MGT.DP_M2C_N3 FMC_MGT.DP_M2C_N4 FMC_MGT.DP_M2C_N5 FMC_MGT.DP_M2C_N6 FMC_MGT.DP_M2C_N7 FMC_MGT.DP_M2C_N8 FMC_MGT.DP_M2C_N9 FMC_MGT.DP_M2C_P0 FMC_MGT.DP_M2C_P1 FMC_MGT.DP_M2C_P2 FMC_MGT.DP_M2C_P3 FMC_MGT.DP_M2C_P4 FMC_MGT.DP_M2C_P5 FMC_MGT.DP_M2C_P6 FMC_MGT.DP_M2C_P7 FMC_MGT.DP_M2C_P8 FMC_MGT.DP_M2C_P9
net class FMC_DP_CLK: FMC_MGT.GBTCLK_M2C_N0 FMC_MGT.GBTCLK_M2C_N1 FMC_MGT.GBTCLK_M2C_P0 FMC_MGT.GBTCLK_M2C_P1
net class FMC_CLK: FMC_CLK.CLK_BIDIR_N2 FMC_CLK.CLK_BIDIR_N3 FMC_CLK.CLK_BIDIR_P2 FMC_CLK.CLK_BIDIR_P3 FMC_CLK.CLK_M2C_N0 FMC_CLK.CLK_M2C_N1 FMC_CLK.CLK_M2C_P0 FMC_CLK.CLK_M2C_P1
net class FMC_CLK_BIDIR_P[2..3]: FMC_CLK_BIDIR_P2 FMC_CLK_BIDIR_P3
net class FMC_CLK_BIDIR_N[2..3]: FMC_CLK_BIDIR_N2 FMC_CLK_BIDIR_N3
net class FMC_CLK.CLK_M2C_P[0..1]: FMC_CLK.CLK_M2C_P0 FMC_CLK.CLK_M2C_P1
net class FMC_CLK.CLK_M2C_N[0..1]: FMC_CLK.CLK_M2C_N0 FMC_CLK.CLK_M2C_N1
net class FMC_CLK.CLK_BIDIR_P[2..3]: FMC_CLK.CLK_BIDIR_P2 FMC_CLK.CLK_BIDIR_P3
net class FMC_CLK.CLK_BIDIR_N[2..3]: FMC_CLK.CLK_BIDIR_N2 FMC_CLK.CLK_BIDIR_N3
net class FMC.LA_P[0..33]: FMC.LA_P0 FMC.LA_P1 FMC.LA_P2 FMC.LA_P3 FMC.LA_P4 FMC.LA_P5 FMC.LA_P6 FMC.LA_P7 FMC.LA_P8 FMC.LA_P9 FMC.LA_P10 FMC.LA_P11 FMC.LA_P12 FMC.LA_P13 FMC.LA_P14 FMC.LA_P15 FMC.LA_P16 FMC.LA_P17 FMC.LA_P18 FMC.LA_P19 FMC.LA_P20 FMC.LA_P21 FMC.LA_P22 FMC.LA_P23 FMC.LA_P24 FMC.LA_P25 FMC.LA_P26 FMC.LA_P27 FMC.LA_P28 FMC.LA_P29 FMC.LA_P30 FMC.LA_P31 FMC.LA_P32 FMC.LA_P33
net class FMC.LA_N[0..33]: FMC.LA_N0 FMC.LA_N1 FMC.LA_N2 FMC.LA_N3 FMC.LA_N4 FMC.LA_N5 FMC.LA_N6 FMC.LA_N7 FMC.LA_N8 FMC.LA_N9 FMC.LA_N10 FMC.LA_N11 FMC.LA_N12 FMC.LA_N13 FMC.LA_N14 FMC.LA_N15 FMC.LA_N16 FMC.LA_N17 FMC.LA_N18 FMC.LA_N19 FMC.LA_N20 FMC.LA_N21 FMC.LA_N22 FMC.LA_N23 FMC.LA_N24 FMC.LA_N25 FMC.LA_N26 FMC.LA_N27 FMC.LA_N28 FMC.LA_N29 FMC.LA_N30 FMC.LA_N31 FMC.LA_N32 FMC.LA_N33
net class FMC.HB_P[0..21]: FMC.HB_P0 FMC.HB_P1 FMC.HB_P2 FMC.HB_P3 FMC.HB_P4 FMC.HB_P5 FMC.HB_P6 FMC.HB_P7 FMC.HB_P8 FMC.HB_P9 FMC.HB_P10 FMC.HB_P11 FMC.HB_P12 FMC.HB_P13 FMC.HB_P14 FMC.HB_P15 FMC.HB_P16 FMC.HB_P17 FMC.HB_P18 FMC.HB_P19 FMC.HB_P20 FMC.HB_P21
net class FMC.HB_N[0..21]: FMC.HB_N0 FMC.HB_N1 FMC.HB_N2 FMC.HB_N3 FMC.HB_N4 FMC.HB_N5 FMC.HB_N6 FMC.HB_N7 FMC.HB_N8 FMC.HB_N9 FMC.HB_N10 FMC.HB_N11 FMC.HB_N12 FMC.HB_N13 FMC.HB_N14 FMC.HB_N15 FMC.HB_N16 FMC.HB_N17 FMC.HB_N18 FMC.HB_N19 FMC.HB_N20 FMC.HB_N21
net class FMC.HA_P[0..23]: FMC.HA_P0 FMC.HA_P1 FMC.HA_P2 FMC.HA_P3 FMC.HA_P4 FMC.HA_P5 FMC.HA_P6 FMC.HA_P7 FMC.HA_P8 FMC.HA_P9 FMC.HA_P10 FMC.HA_P11 FMC.HA_P12 FMC.HA_P13 FMC.HA_P14 FMC.HA_P15 FMC.HA_P16 FMC.HA_P17 FMC.HA_P18 FMC.HA_P19 FMC.HA_P20 FMC.HA_P21 FMC.HA_P22 FMC.HA_P23
net class FMC.HA_N[0..23]: FMC.HA_N0 FMC.HA_N1 FMC.HA_N2 FMC.HA_N3 FMC.HA_N4 FMC.HA_N5 FMC.HA_N6 FMC.HA_N7 FMC.HA_N8 FMC.HA_N9 FMC.HA_N10 FMC.HA_N11 FMC.HA_N12 FMC.HA_N13 FMC.HA_N14 FMC.HA_N15 FMC.HA_N16 FMC.HA_N17 FMC.HA_N18 FMC.HA_N19 FMC.HA_N20 FMC.HA_N21 FMC.HA_N22 FMC.HA_N23
net class EEM_IO.LVDS_P[0..15]: EEM_IO.LVDS_P0 EEM_IO.LVDS_P1 EEM_IO.LVDS_P2 EEM_IO.LVDS_P3 EEM_IO.LVDS_P4 EEM_IO.LVDS_P5 EEM_IO.LVDS_P6 EEM_IO.LVDS_P7 EEM_IO.LVDS_P8 EEM_IO.LVDS_P9 EEM_IO.LVDS_P10 EEM_IO.LVDS_P11 EEM_IO.LVDS_P12 EEM_IO.LVDS_P13 EEM_IO.LVDS_P14 EEM_IO.LVDS_P15
net class EEM_IO.LVDS_N[0..15]: EEM_IO.LVDS_N0 EEM_IO.LVDS_N1 EEM_IO.LVDS_N2 EEM_IO.LVDS_N3 EEM_IO.LVDS_N4 EEM_IO.LVDS_N5 EEM_IO.LVDS_N6 EEM_IO.LVDS_N7 EEM_IO.LVDS_N8 EEM_IO.LVDS_N9 EEM_IO.LVDS_N10 EEM_IO.LVDS_N11 EEM_IO.LVDS_N12 EEM_IO.LVDS_N13 EEM_IO.LVDS_N14 EEM_IO.LVDS_N15
net class BP_IO.LVDS_P[0..15]: BP_IO.LVDS_P0 BP_IO.LVDS_P1 BP_IO.LVDS_P2 BP_IO.LVDS_P3 BP_IO.LVDS_P4 BP_IO.LVDS_P5 BP_IO.LVDS_P6 BP_IO.LVDS_P7 BP_IO.LVDS_P8 BP_IO.LVDS_P9 BP_IO.LVDS_P10 BP_IO.LVDS_P11 BP_IO.LVDS_P12 BP_IO.LVDS_P13 BP_IO.LVDS_P14 BP_IO.LVDS_P15
net class BP_IO.LVDS_N[0..15]: BP_IO.LVDS_N0 BP_IO.LVDS_N1 BP_IO.LVDS_N2 BP_IO.LVDS_N3 BP_IO.LVDS_N4 BP_IO.LVDS_N5 BP_IO.LVDS_N6 BP_IO.LVDS_N7 BP_IO.LVDS_N8 BP_IO.LVDS_N9 BP_IO.LVDS_N10 BP_IO.LVDS_N11 BP_IO.LVDS_N12 BP_IO.LVDS_N13 BP_IO.LVDS_N14 BP_IO.LVDS_N15
component class U_FMC_connector: C171 C176 C193 C194 C195 C196 C197 C198 C199 C200 C203 C204 C205 C206 C207 C208 C209 C210 C211 C213 C214 C215 C216 C217 C218 C290 C291 C292 C293 C294 C295 C296 C297 J5 R121 R122 R123 R124
component class CPCIS_Connectors_P1_P6: C154 C155 C165 C166 C167 D5 D6 D7 D12 D13 IC38 IC39 J6 J7 R38 R39 R40 R41 R125 R127 R128 R130 R131 R132 R133 R134 R135 R136 R137 R138 R139 R140 R141 R142 R197 R199 R245 R246 R257 R260 R261 R262 R264 R265 R266 R267 R268 R269 R270 R274 R275 R276 R277 R279 R280 R281 R282 T15 T24 T25 T26
component class U_FPGA_GTP: C14 C17 C18 C19 C20 C42 C52 C53 C54 C55 C56 C57 C58 C59 C192 C287 C299 C300 C301 C302 C303 C321 C322 Cage1 IC36 IC41 J3 L6 L7 LD13 Plate1 R18 R26 R117 R118 R179 R180 R251 R252 R253 R254 R278 R284 R285 R286 R287 T17 T22 T23
component class EEM_FMC_Carrier: B6 B7 B8 B9 C212 FTG1 FTG2 FTG3 FTG4 FTG5 FTG6 J4 M1 M2 M3 M4 M5 M6 M7 M8 R119 R120 R126
component class U_CLK_INPUT: 3 C1 C2 C3 C4 C5 C6 C7 C8 C9 C10 C11 C12 C13 C15 C16 C21 C22 C23 C24 C25 C26 C27 C28 C29 C30 C31 C32 C33 C34 C35 C36 C37 C38 C39 IC1 IC2 IC3 L1 L2 OSC1 R1 R2 R4 R5 R6 R7 R8 R9 R10 R11 R12 R13 R14 R15 R16 R20 R21 R22 R23 R79 R80 R256 SW1 T18 TR1
component class U_FPGA_SDRAM: C44 C78 C79 C80 C81 C82 C83 C84 C85 C86 C87 C88 C89 C90 C91 C92 C93 C94 C95 C96 C201 C202 C286 C304 C305 IC11 IC12 IC13 IC35 L29 R42 R43 R46 R47 R48 R49 R50 R51 R52 R53 R54 R55 R56 R57 R58 R59 R60 R61 R62 R63 R64 R65 R66 R67 R68 R69 R70 R71 R72 R73 R74 R75 R247 R248 R258 R259
component class U_FPGA_SUP_CFG: C97 C98 C99 C100 C101 C102 C103 C104 C105 C106 C107 C108 C109 C110 C112 C113 C115 C116 C117 C118 C119 C120 C121 C122 C123 C124 C125 C126 C127 C128 C129 C130 C131 C132 C133 C134 C135 C136 C137 C138 C139 C140 C141 C142 C143 C144 C145 C146 C147 C148 C149 C150 C151 C152 C153 C156 C157 C158 C159 C160 C161 C162 C163 C164 C168 C169 C170 C172 C173 C174 C175 C177 C178 C182 C183 C288 C289 C308 C309 C310 C311 C312 C313 C314 C315 C316 C317 C318 C319 C320 HS1 L3 L4 L5 LD1 R76 R78 R81 R82 R83 R84 T16
component class U_PWR_Supply: C40 C43 C227 C228 C229 C230 C231 C232 C233 C234 C235 C237 C238 C245 C248 C249 C250 C251 C252 C253 C254 C255 C256 C257 C258 C259 C260 C261 C262 C263 C264 C265 C266 C267 C268 C269 C270 C271 C272 C273 C274 C275 C276 C277 C278 C279 C280 C281 C282 C283 C284 C285 D10 FL1 IC14 IC32 IC33 IC34 J10 J11 L9 L10 L11 L13 L19 L20 L21 L22 L23 L24 L25 L26 L27 L28 LD3 LD4 LD5 LD6 LD7 LD8 LD9 LD10 LD11 LD12 LD14 R160 R165 R166 R184 R185 R186 R187 R188 R189 R190 R191 R192 R194 R200 R201 R202 R203 R204 R205 R206 R207 R208 R209 R210 R211 R212 R213 R214 R215 R216 R217 R218 R219 R220 R221 R222 R223 R224 R225 R228 R229 R230 R231 R232 R233 R234 R235 R236 R237 R238 R239 R240 R241 R242 R243 R244 R249 R250 R263 R283 T7 T8 T9 T10 T11 T12 T13 T14 T20 TP1 TP2 TP3 TP4 TP5 TP6 TP7 TP8 TP9 TP10 W1 W2
component class U_CFG_FLASH_Update: B1 B2 B3 C179 C180 C181 C184 C185 C186 C187 C188 C189 C190 C191 D3 D4 IC15 IC16 IC18 IC19 IC20 IC21 IC22 IC23 IC24 J2 R85 R86 R87 R88 R89 R90 R91 R92 R93 R94 R95 R96 R97 R98 R99 R100 R101 R102 R103 R104 R105 R106 R107 R108 R109 R110 R111 R112 R113 R114 R115 R116 T4 T5 T6
component class U_I2C: C74 C77 C111 C114 C323 IC8 IC10 IC37 IC44 IC45 LD2 LD15 LD18 R19 R28 R29 R30 R31 R32 R33 R37 R44 R45 R178 R226 R227 R255 R288 T3 T19 T21
net class 50Ohm: DDR3_A0 DDR3_A1 DDR3_A2 DDR3_A3 DDR3_A4 DDR3_A5 DDR3_A6 DDR3_A7 DDR3_A8 DDR3_A9 DDR3_A10 DDR3_A11 DDR3_A12 DDR3_A13 DDR3_A14 DDR3_BA0 DDR3_BA1 DDR3_BA2 DDR3_CAS_N DDR3_CK_N DDR3_CK_P DDR3_CKE DDR3_DQ0 DDR3_DQ1 DDR3_DQ2 DDR3_DQ3 DDR3_DQ4 DDR3_DQ5 DDR3_DQ6 DDR3_DQ7 DDR3_DQ8 DDR3_DQ9 DDR3_DQ10 DDR3_DQ11 DDR3_DQ12 DDR3_DQ13 DDR3_DQ14 DDR3_DQ15 DDR3_LDM DDR3_LDQS_N DDR3_LDQS_P DDR3_ODT DDR3_RAS_N DDR3_UDM DDR3_UDQS_N DDR3_UDQS_P DDR3_WE_N NetC3_1 NetC3_2
net class DDR_AddressAndControls: DDR3_A0 DDR3_A1 DDR3_A2 DDR3_A3 DDR3_A4 DDR3_A5 DDR3_A6 DDR3_A7 DDR3_A8 DDR3_A9 DDR3_A10 DDR3_A11 DDR3_A12 DDR3_A13 DDR3_A14 DDR3_BA0 DDR3_BA1 DDR3_BA2 DDR3_CAS_N DDR3_CK_N DDR3_CK_P DDR3_CKE DDR3_ODT DDR3_RAS_N DDR3_WE_N
net class DDR_BL0: DDR3_DQ0 DDR3_DQ1 DDR3_DQ2 DDR3_DQ3 DDR3_DQ4 DDR3_DQ5 DDR3_DQ6 DDR3_DQ7 DDR3_DQ8 DDR3_DQ9 DDR3_DQ10 DDR3_DQ11 DDR3_DQ12 DDR3_DQ13 DDR3_DQ14 DDR3_DQ15 DDR3_LDM DDR3_LDQS_N DDR3_LDQS_P DDR3_UDM DDR3_UDQS_N DDR3_UDQS_P
pad class MH: B6-1 B7-1 B8-1 B9-1 J5-1 J5-2 M1-1 M2-1 M3-1 M4-1
component class U_FPGA_FMC: C41 C45 C46 C47 C48 C49 C50 C51 C64 C65 IC4 IC5 IC6 IC7 R17 R24 R25 SW2
component class EEM_Connectors_JTAG: C219 C220 C221 C222 C223 C224 C225 C226 C298 C306 C307 D8 IC25 IC26 IC27 IC28 IC29 IC30 IC31 IC40 IC42 IC43 J8 J9 R3 R77 R143 R144 R145 R146 R147 R148 R149 R150 R151 R152 R153 R154 R155 R156 R157 R158 R159 R161 R162 R163 R164 R167 R168 R169 R170 R171 R172 R173 R174 R175 R176 R177 R181 R182 R183
differential pair MGT_RXC2: +MGT_RXC2_P -MGT_RXC2_N
differential pair MGT_RXC3: +MGT_RXC3_P -MGT_RXC3_N
differential pair MGT_RX1: +MGT_RX1_P -MGT_RX1_N
differential pair MGT_RX0: +MGT_RX0_P -MGT_RX0_N
differential pair MGT_TX2: +MGT_TX2_P -MGT_TX2_N
differential pair MGT_RX2: +MGT_RX2_P -MGT_RX2_N
differential pair SFP_TD: +SFP_TD_P -SFP_TD_N
differential pair SFP_RD: +SFP_RD_P -SFP_RD_N
differential pair BP_MGT_Rx: +BP_MGT_Rx_P -BP_MGT_Rx_N
differential pair OSC: +OSC_P -OSC_N
differential pair FMC_REF0_CLK.CLK: +FMC_REF0_CLK.CLK_P -FMC_REF0_CLK.CLK_N
differential pair FMC_REF1_CLK.CLK: +FMC_REF1_CLK.CLK_P -FMC_REF1_CLK.CLK_N
differential pair BP_MGT_Tx: +BP_MGT_Tx_P -BP_MGT_Tx_N
differential pair PE_CLK.CLK: +PE_CLK.CLK_P -PE_CLK.CLK_N
differential pair GTP_CLK: +GTP_CLK_P -GTP_CLK_N
differential pair BP_MGT.Rx: +BP_MGT.Rx_P -BP_MGT.Rx_N
differential pair LVDS_DUAL4: +LVDS_DUAL_P4 -LVDS_DUAL_N4
differential pair LVDS_DUAL3: +LVDS_DUAL_P3 -LVDS_DUAL_N3
differential pair LVDS_DUAL2: +LVDS_DUAL_P2 -LVDS_DUAL_N2
differential pair LVDS_DUAL1: +LVDS_DUAL_P1 -LVDS_DUAL_N1
differential pair LVDS_DUAL0: +LVDS_DUAL_P0 -LVDS_DUAL_N0
differential pair PE_CLK_ALT: +PE_CLK_ALT_P -PE_CLK_ALT_N
differential pair PE_CK: +PE_CK_P -PE_CK_N
differential pair CLK_MUX_OUT0: +CLK_MUX_OUT0_P -CLK_MUX_OUT0_N
differential pair CLK_MUX_ALT_OUT1: +CLK_MUX_ALT_OUT1_P -CLK_MUX_ALT_OUT1_N
differential pair CLK_MUX_ALT_OUT0: +CLK_MUX_ALT_OUT0_P -CLK_MUX_ALT_OUT0_N
differential pair CK_OSC_ALT: +CK_OSC_ALT_P -CK_OSC_ALT_N
differential pair CK_MUX_OUT0: +CK_MUX_OUT0_P -CK_MUX_OUT0_N
differential pair CK_MMCX_ALT: +CK_MMCX_ALT_P -CK_MMCX_ALT_N
differential pair PE_CLK: +PE_CLK_P -PE_CLK_N
differential pair LVDS_JTAG_TRSTn: +LVDS_JTAG_TRSTn_P -LVDS_JTAG_TRSTn_N
differential pair LVDS_JTAG_TMS: +LVDS_JTAG_TMS_P -LVDS_JTAG_TMS_N
differential pair LVDS_JTAG_TDO: +LVDS_JTAG_TDO_P -LVDS_JTAG_TDO_N
differential pair LVDS_JTAG_TDI: +LVDS_JTAG_TDI_P -LVDS_JTAG_TDI_N
differential pair LVDS_JTAG_TCK: +LVDS_JTAG_TCK_P -LVDS_JTAG_TCK_N
differential pair GTP_CLK.CLK: +GTP_CLK.CLK_P -GTP_CLK.CLK_N
differential pair FMC_MGT.GBTCLK_M2C1: +FMC_MGT.GBTCLK_M2C_P1 -FMC_MGT.GBTCLK_M2C_N1
differential pair FMC_MGT.GBTCLK_M2C0: +FMC_MGT.GBTCLK_M2C_P0 -FMC_MGT.GBTCLK_M2C_N0
differential pair FMC_MGT.DP_M2C9: +FMC_MGT.DP_M2C_P9 -FMC_MGT.DP_M2C_N9
differential pair FMC_MGT.DP_M2C8: +FMC_MGT.DP_M2C_P8 -FMC_MGT.DP_M2C_N8
differential pair FMC_MGT.DP_M2C7: +FMC_MGT.DP_M2C_P7 -FMC_MGT.DP_M2C_N7
differential pair FMC_MGT.DP_M2C6: +FMC_MGT.DP_M2C_P6 -FMC_MGT.DP_M2C_N6
differential pair FMC_MGT.DP_M2C5: +FMC_MGT.DP_M2C_P5 -FMC_MGT.DP_M2C_N5
differential pair FMC_MGT.DP_M2C4: +FMC_MGT.DP_M2C_P4 -FMC_MGT.DP_M2C_N4
differential pair FMC_MGT.DP_M2C3: +FMC_MGT.DP_M2C_P3 -FMC_MGT.DP_M2C_N3
differential pair FMC_MGT.DP_M2C2: +FMC_MGT.DP_M2C_P2 -FMC_MGT.DP_M2C_N2
differential pair FMC_MGT.DP_M2C1: +FMC_MGT.DP_M2C_P1 -FMC_MGT.DP_M2C_N1
differential pair FMC_MGT.DP_M2C0: +FMC_MGT.DP_M2C_P0 -FMC_MGT.DP_M2C_N0
differential pair FMC_MGT.DP_C2M9: +FMC_MGT.DP_C2M_P9 -FMC_MGT.DP_C2M_N9
differential pair FMC_MGT.DP_C2M8: +FMC_MGT.DP_C2M_P8 -FMC_MGT.DP_C2M_N8
differential pair FMC_MGT.DP_C2M7: +FMC_MGT.DP_C2M_P7 -FMC_MGT.DP_C2M_N7
differential pair FMC_MGT.DP_C2M6: +FMC_MGT.DP_C2M_P6 -FMC_MGT.DP_C2M_N6
differential pair FMC_MGT.DP_C2M5: +FMC_MGT.DP_C2M_P5 -FMC_MGT.DP_C2M_N5
differential pair FMC_MGT.DP_C2M4: +FMC_MGT.DP_C2M_P4 -FMC_MGT.DP_C2M_N4
differential pair FMC_MGT.DP_C2M3: +FMC_MGT.DP_C2M_P3 -FMC_MGT.DP_C2M_N3
differential pair FMC_MGT.DP_C2M2: +FMC_MGT.DP_C2M_P2 -FMC_MGT.DP_C2M_N2
differential pair FMC_MGT.DP_C2M1: +FMC_MGT.DP_C2M_P1 -FMC_MGT.DP_C2M_N1
differential pair FMC_MGT.DP_C2M0: +FMC_MGT.DP_C2M_P0 -FMC_MGT.DP_C2M_N0
differential pair FMC_CLK_BIDIR3: +FMC_CLK_BIDIR_P3 -FMC_CLK_BIDIR_N3
differential pair FMC_CLK_BIDIR2: +FMC_CLK_BIDIR_P2 -FMC_CLK_BIDIR_N2
differential pair FMC_CLK.CLK_M2C1: +FMC_CLK.CLK_M2C_P1 -FMC_CLK.CLK_M2C_N1
differential pair FMC_CLK.CLK_M2C0: +FMC_CLK.CLK_M2C_P0 -FMC_CLK.CLK_M2C_N0
differential pair FMC_CLK.CLK_BIDIR3: +FMC_CLK.CLK_BIDIR_P3 -FMC_CLK.CLK_BIDIR_N3
differential pair FMC_CLK.CLK_BIDIR2: +FMC_CLK.CLK_BIDIR_P2 -FMC_CLK.CLK_BIDIR_N2
differential pair FMC.LA33: +FMC.LA_P33 -FMC.LA_N33
differential pair FMC.LA32: +FMC.LA_P32 -FMC.LA_N32
differential pair FMC.LA31: +FMC.LA_P31 -FMC.LA_N31
differential pair FMC.LA30: +FMC.LA_P30 -FMC.LA_N30
differential pair FMC.LA29: +FMC.LA_P29 -FMC.LA_N29
differential pair FMC.LA28: +FMC.LA_P28 -FMC.LA_N28
differential pair FMC.LA27: +FMC.LA_P27 -FMC.LA_N27
differential pair FMC.LA26: +FMC.LA_P26 -FMC.LA_N26
differential pair FMC.LA25: +FMC.LA_P25 -FMC.LA_N25
differential pair FMC.LA24: +FMC.LA_P24 -FMC.LA_N24
differential pair FMC.LA23: +FMC.LA_P23 -FMC.LA_N23
differential pair FMC.LA22: +FMC.LA_P22 -FMC.LA_N22
differential pair FMC.LA21: +FMC.LA_P21 -FMC.LA_N21
differential pair FMC.LA20: +FMC.LA_P20 -FMC.LA_N20
differential pair FMC.LA19: +FMC.LA_P19 -FMC.LA_N19
differential pair FMC.LA18: +FMC.LA_P18 -FMC.LA_N18
differential pair FMC.LA17: +FMC.LA_P17 -FMC.LA_N17
differential pair FMC.LA16: +FMC.LA_P16 -FMC.LA_N16
differential pair FMC.LA15: +FMC.LA_P15 -FMC.LA_N15
differential pair FMC.LA14: +FMC.LA_P14 -FMC.LA_N14
differential pair FMC.LA13: +FMC.LA_P13 -FMC.LA_N13
differential pair FMC.LA12: +FMC.LA_P12 -FMC.LA_N12
differential pair FMC.LA11: +FMC.LA_P11 -FMC.LA_N11
differential pair FMC.LA10: +FMC.LA_P10 -FMC.LA_N10
differential pair FMC.LA9: +FMC.LA_P9 -FMC.LA_N9
differential pair FMC.LA8: +FMC.LA_P8 -FMC.LA_N8
differential pair FMC.LA7: +FMC.LA_P7 -FMC.LA_N7
differential pair FMC.LA6: +FMC.LA_P6 -FMC.LA_N6